# Altium PCB slave.PcbDoc (part 1 of 8)
Units mm, origin at the board's own origin, x right, y up, seen from the top; angles counter-clockwise.
Board outline 160 x 100 mm, 6 copper layers (Top, FUSED_VBAT-, Signals1, Signals2, SUPPLY, Bottom), stack 1.67 mm thick; 597 components, 381 nets, 1695 pads, 3029 vias.
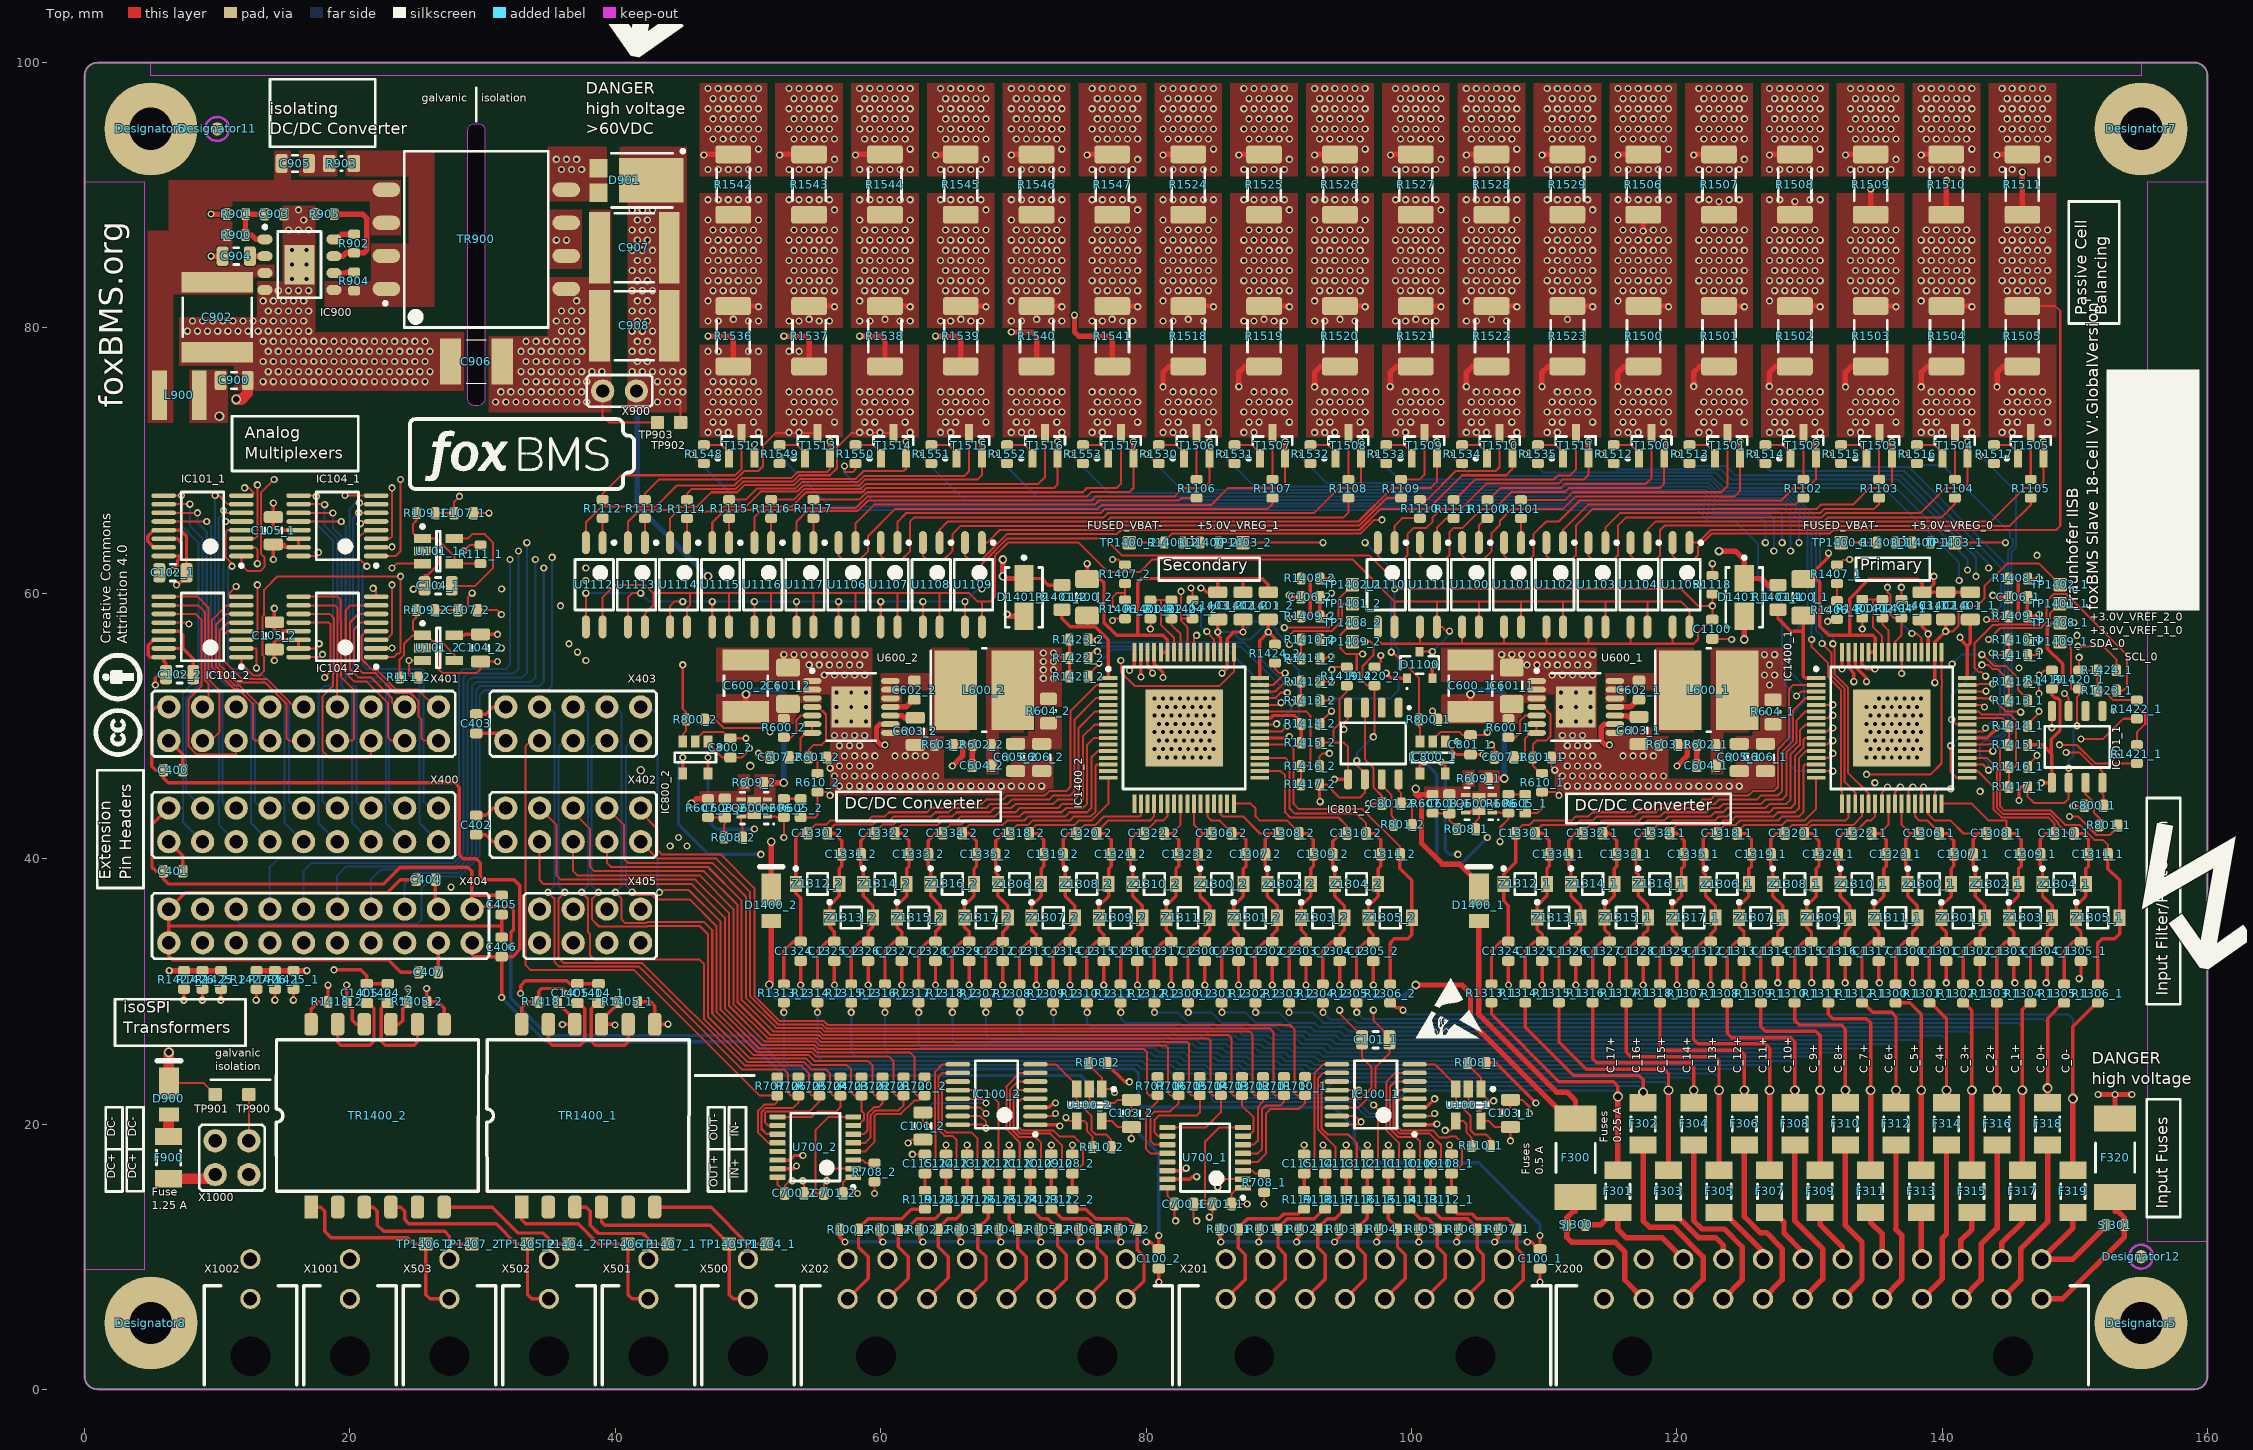
[diagram p0: Top view]
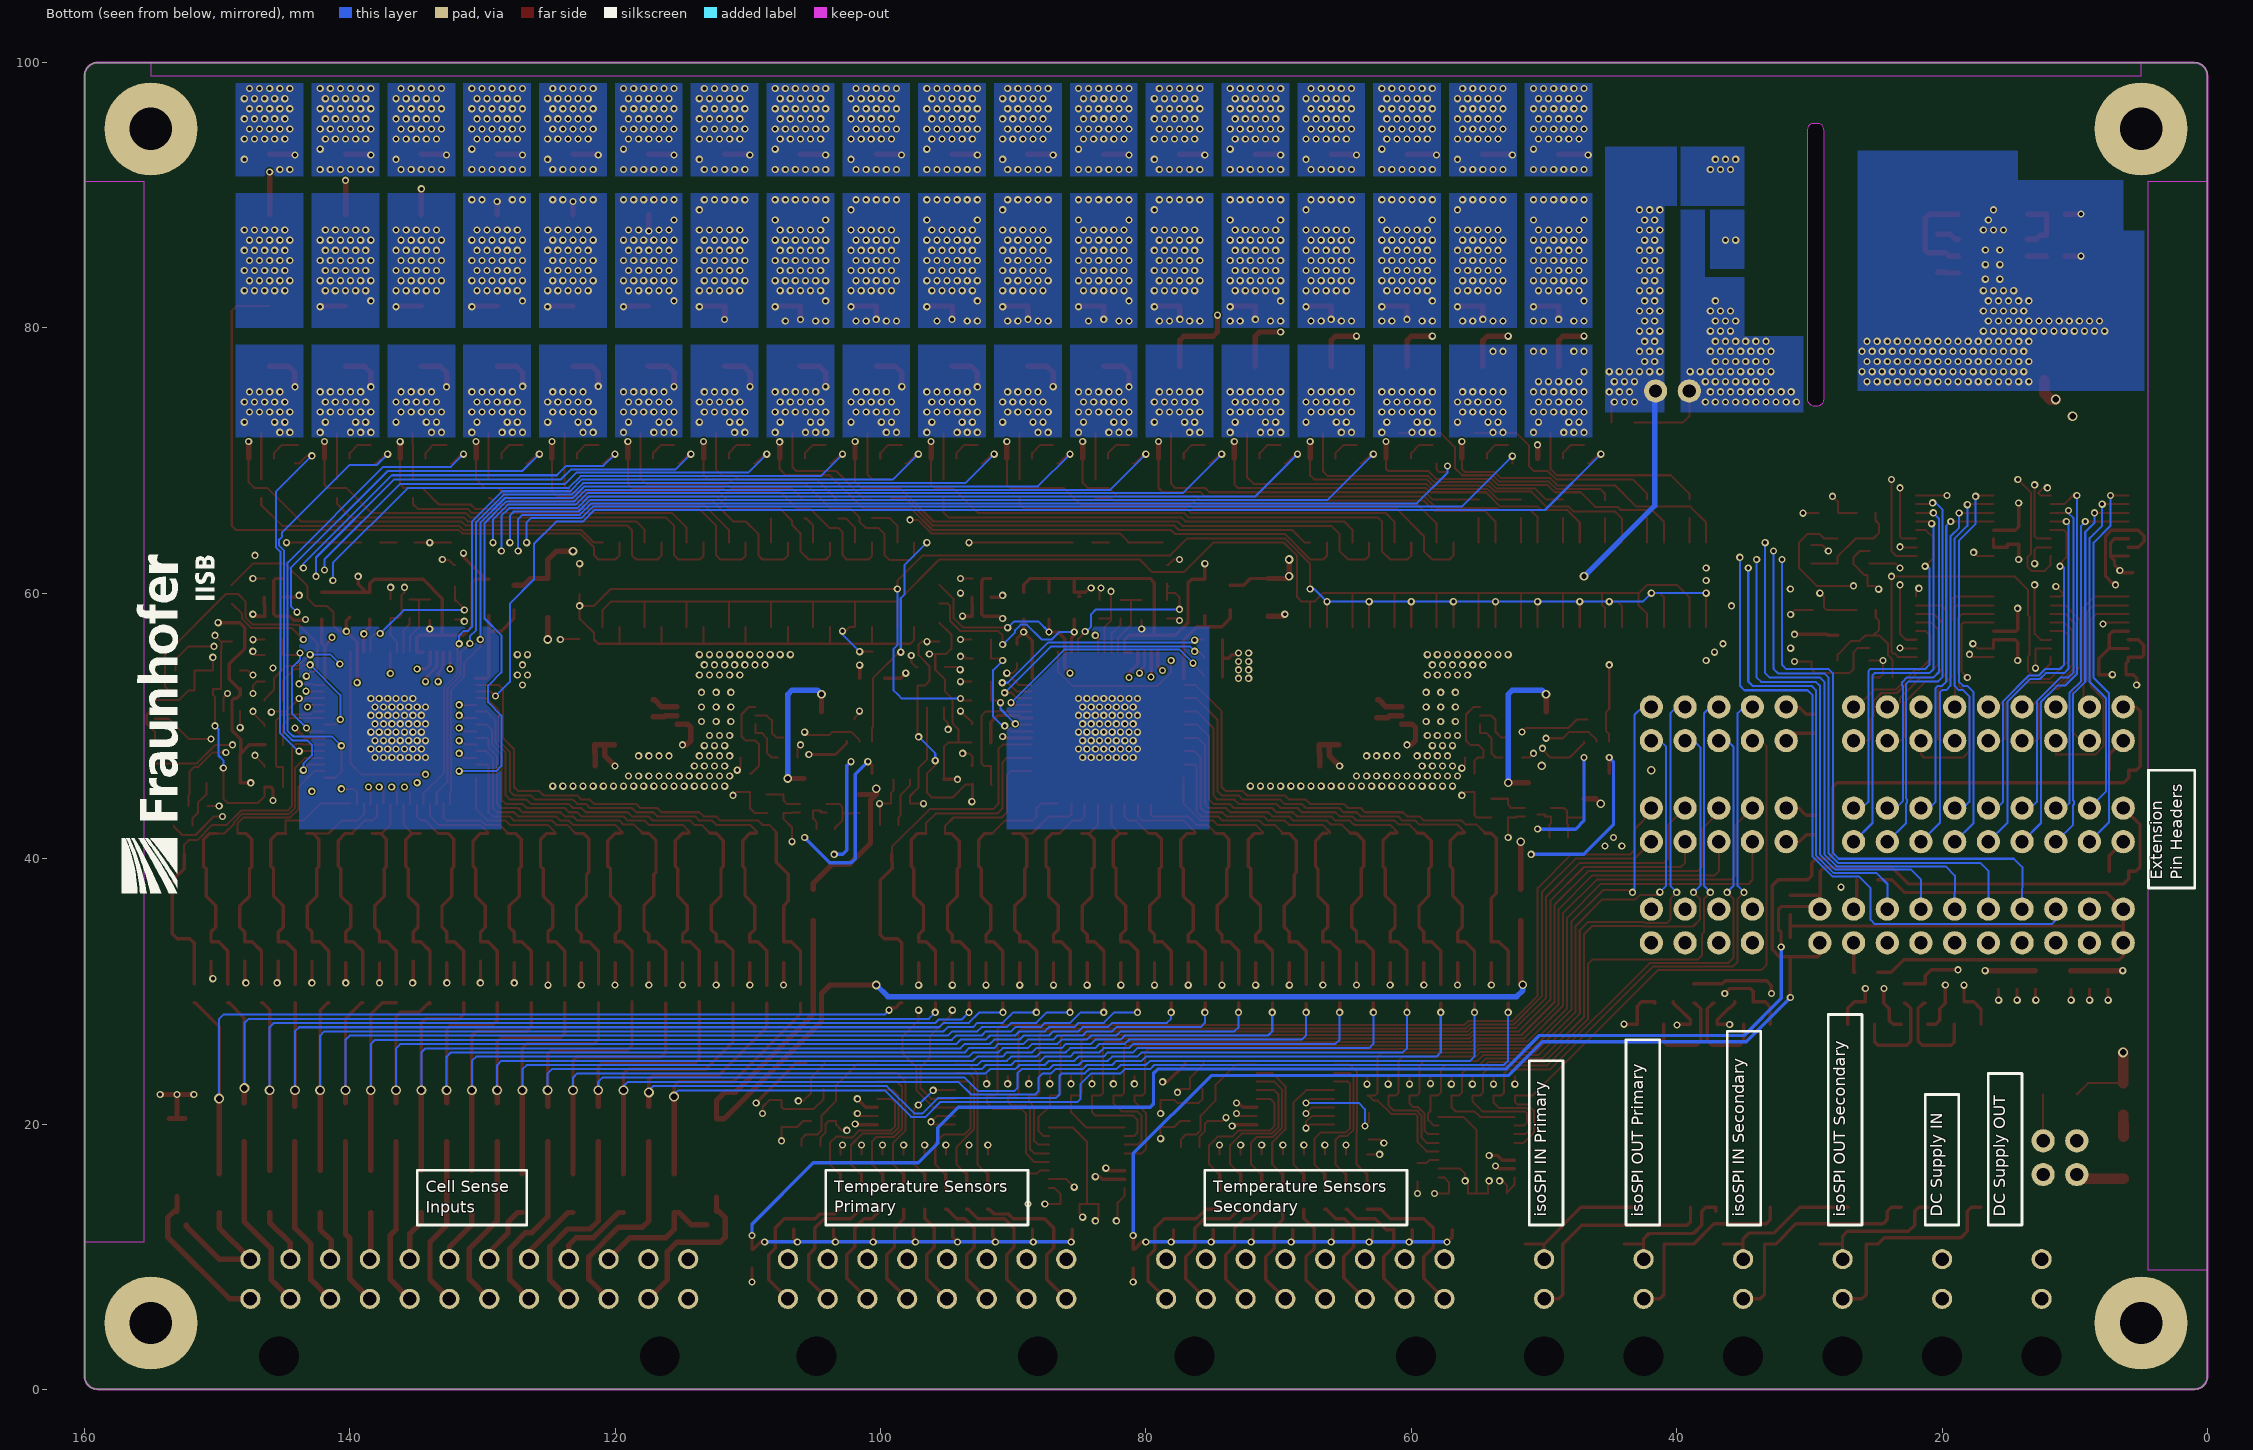
[diagram p1: Bottom view, seen from below]
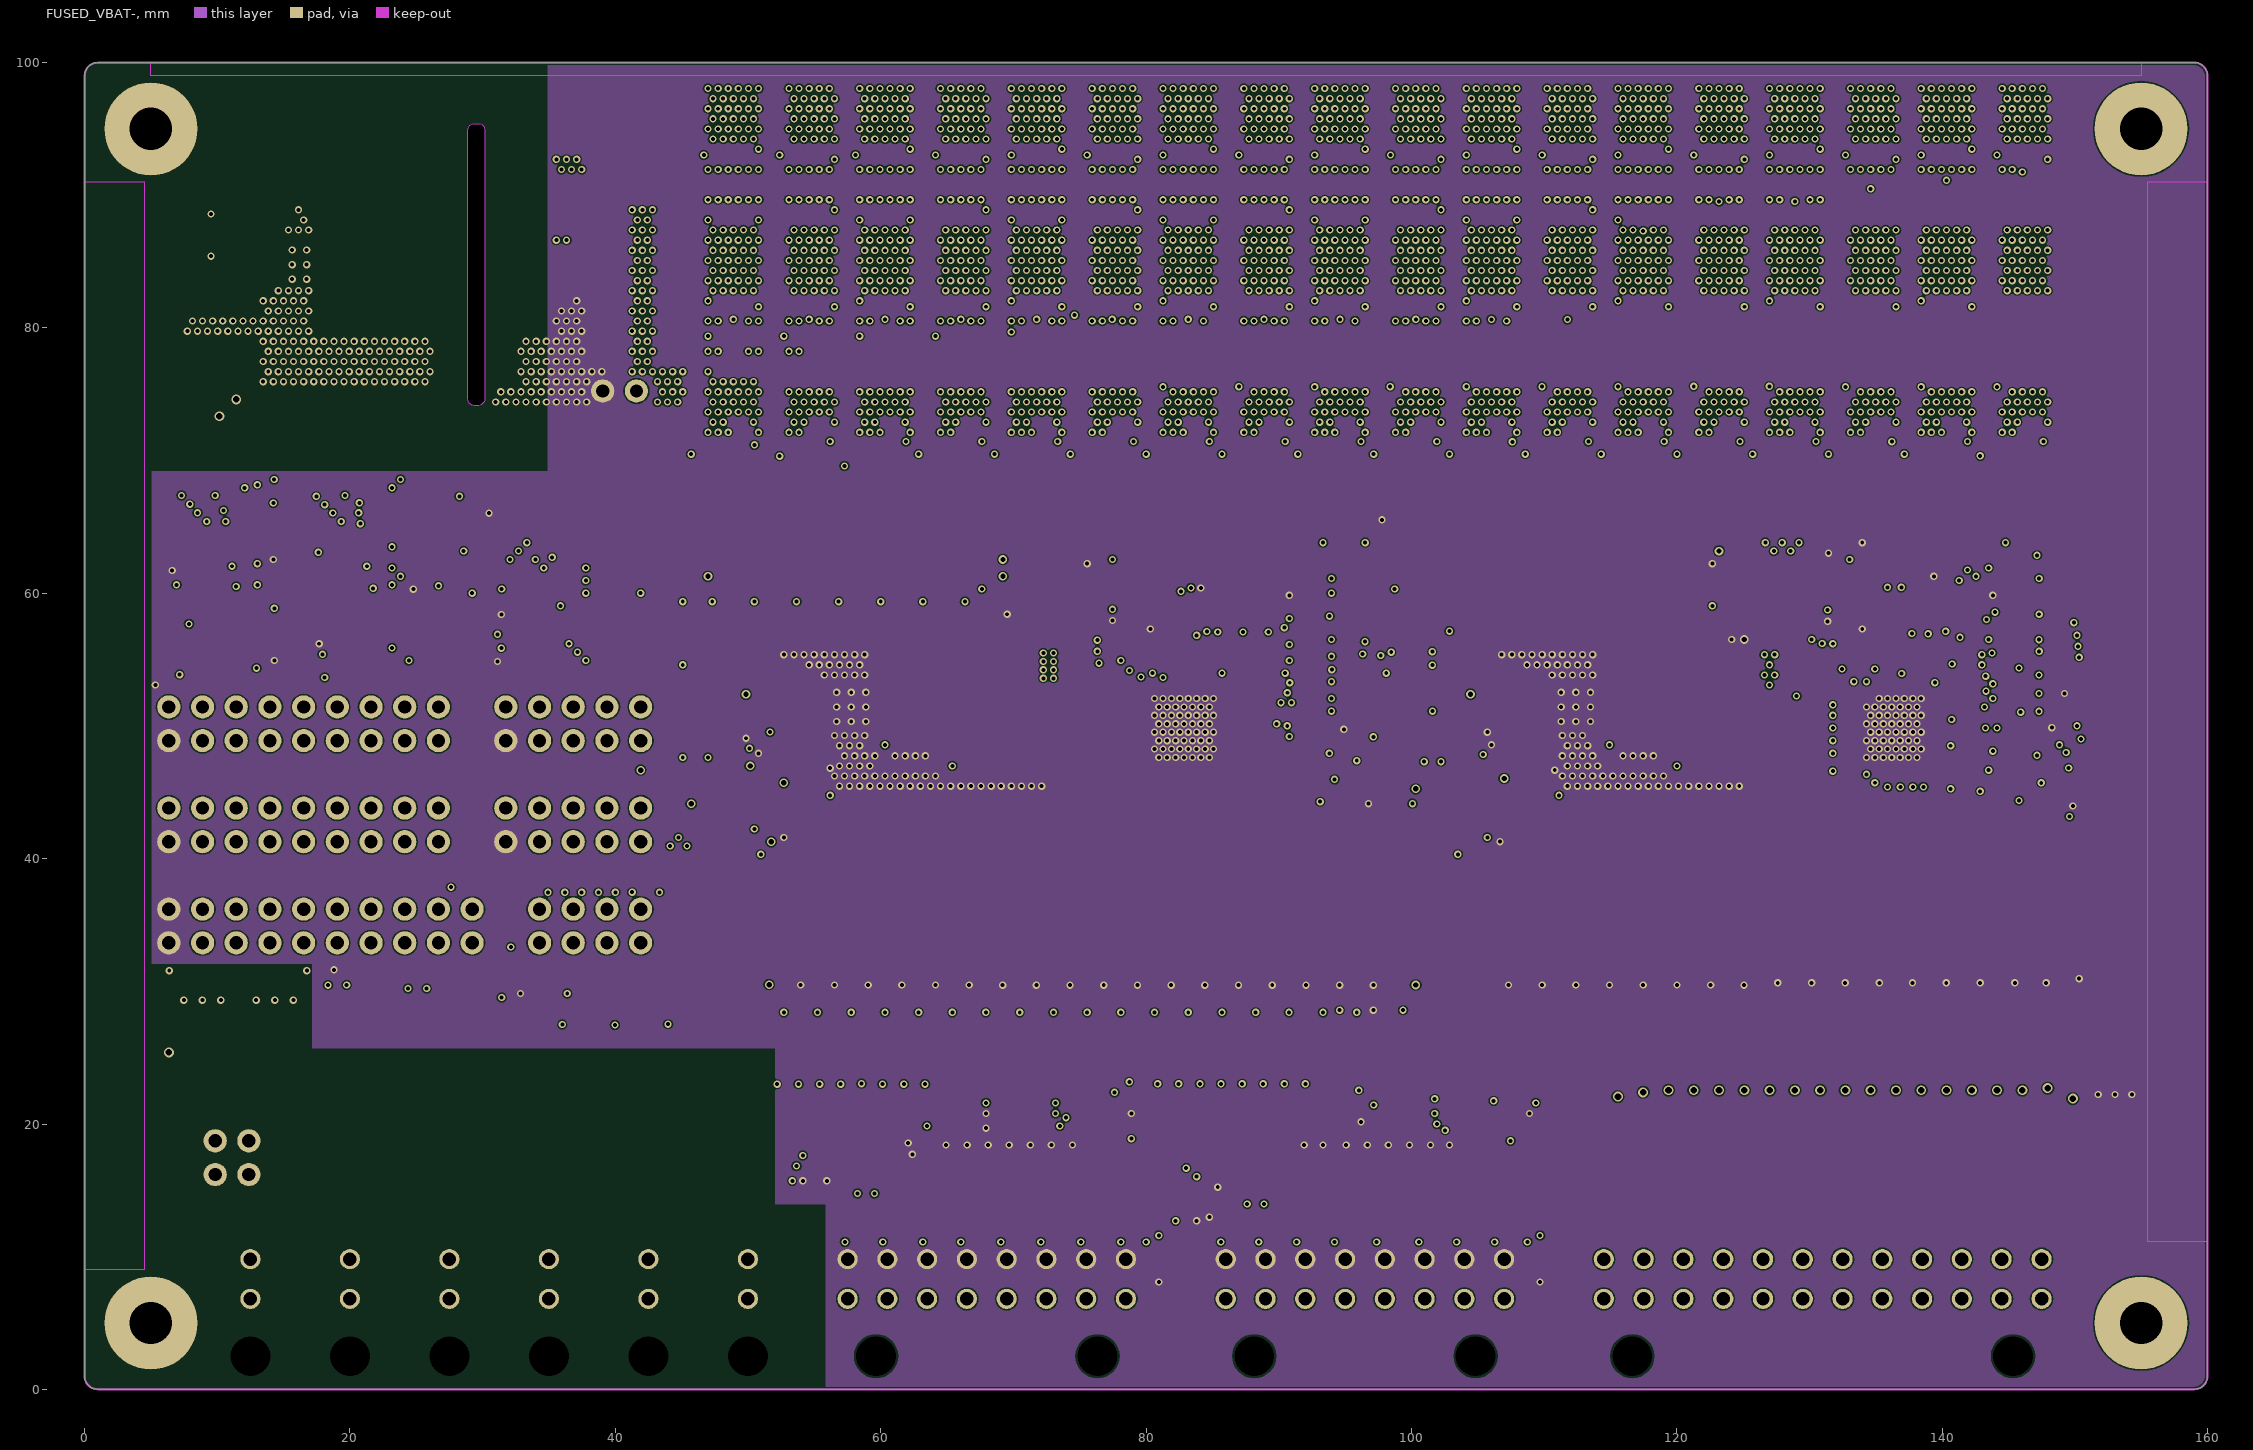
[diagram p2: FUSED_VBAT-]
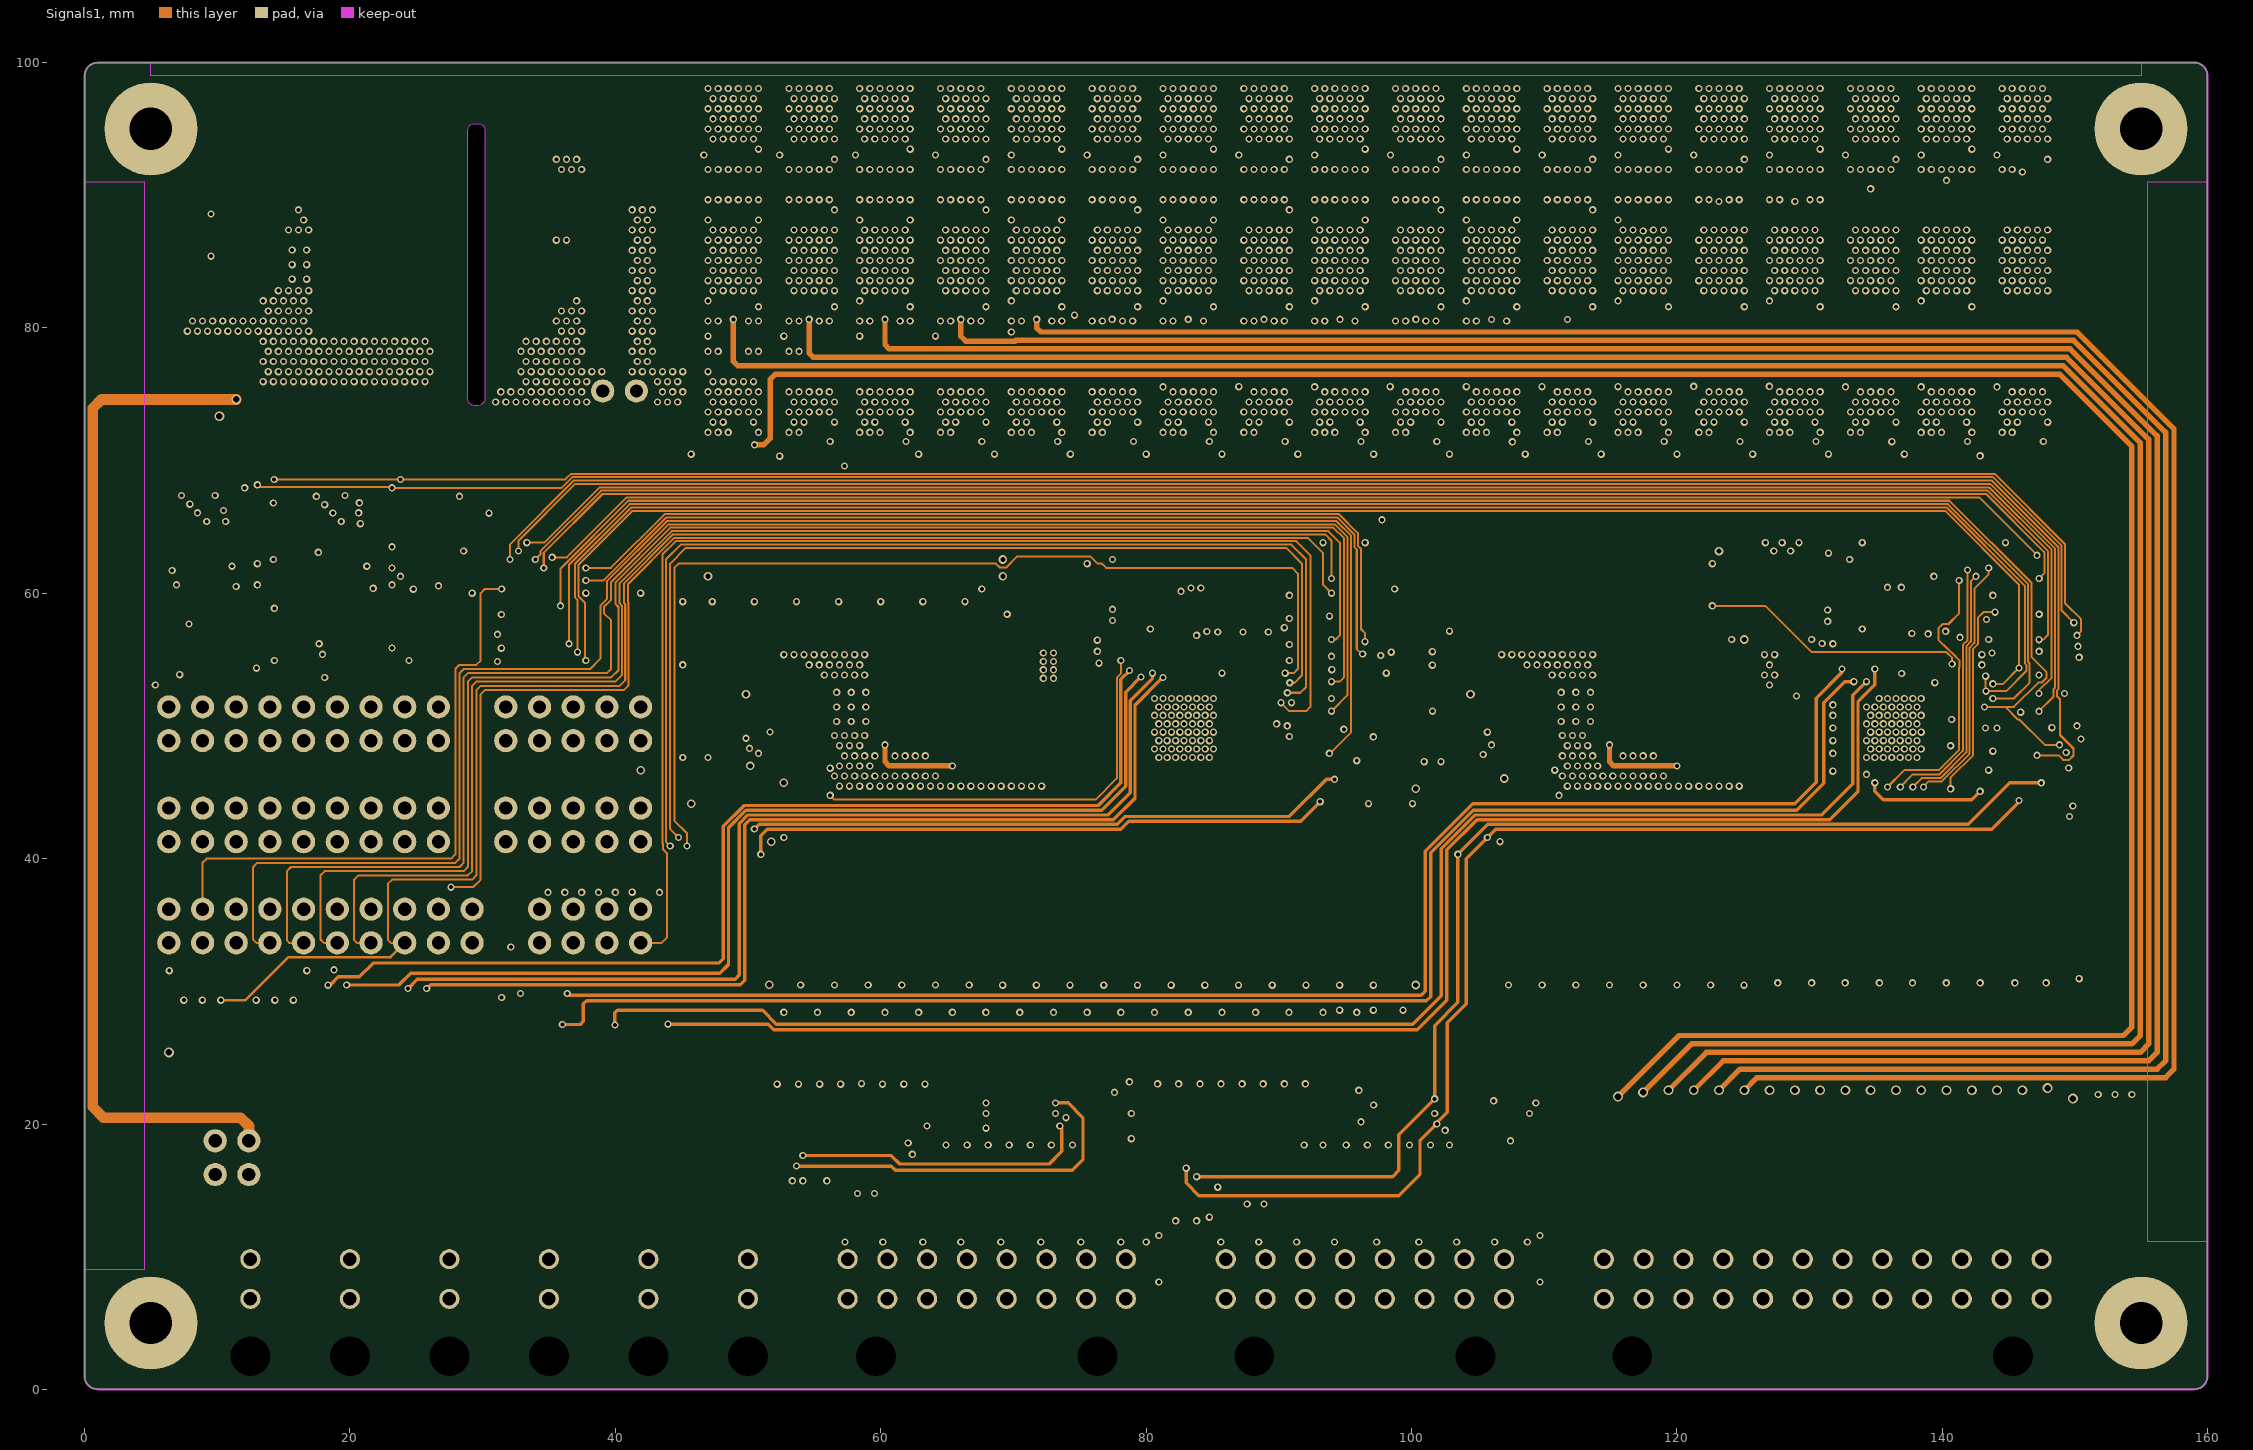
[diagram p3: Signals1]
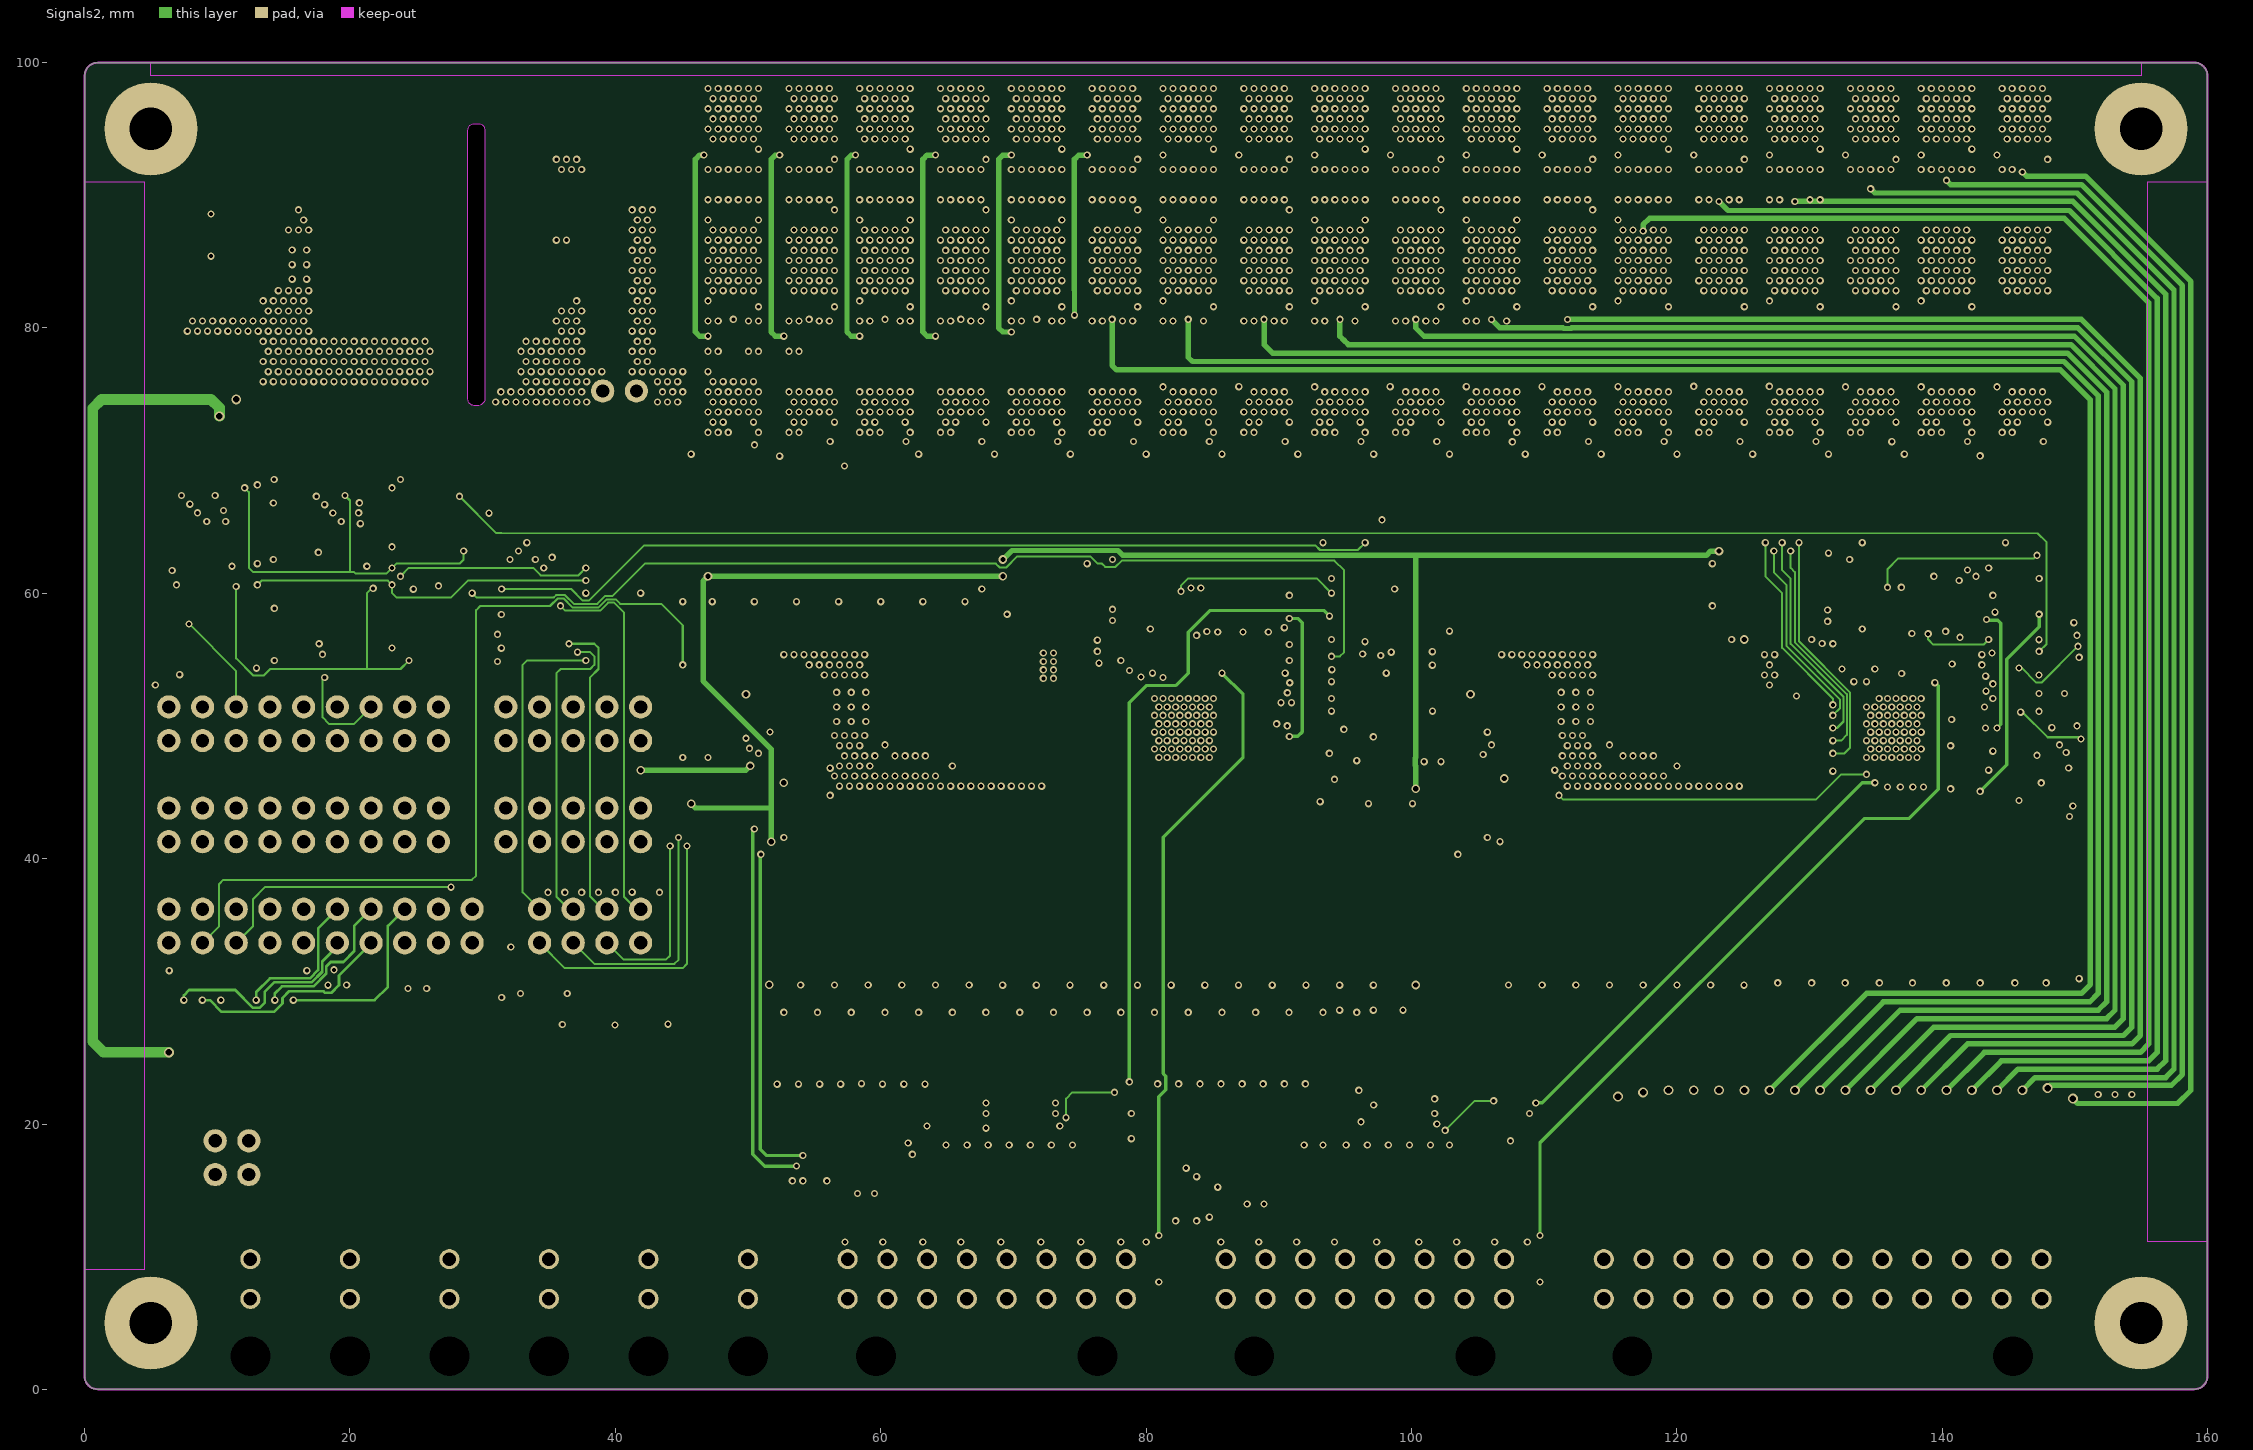
[diagram p4: Signals2]
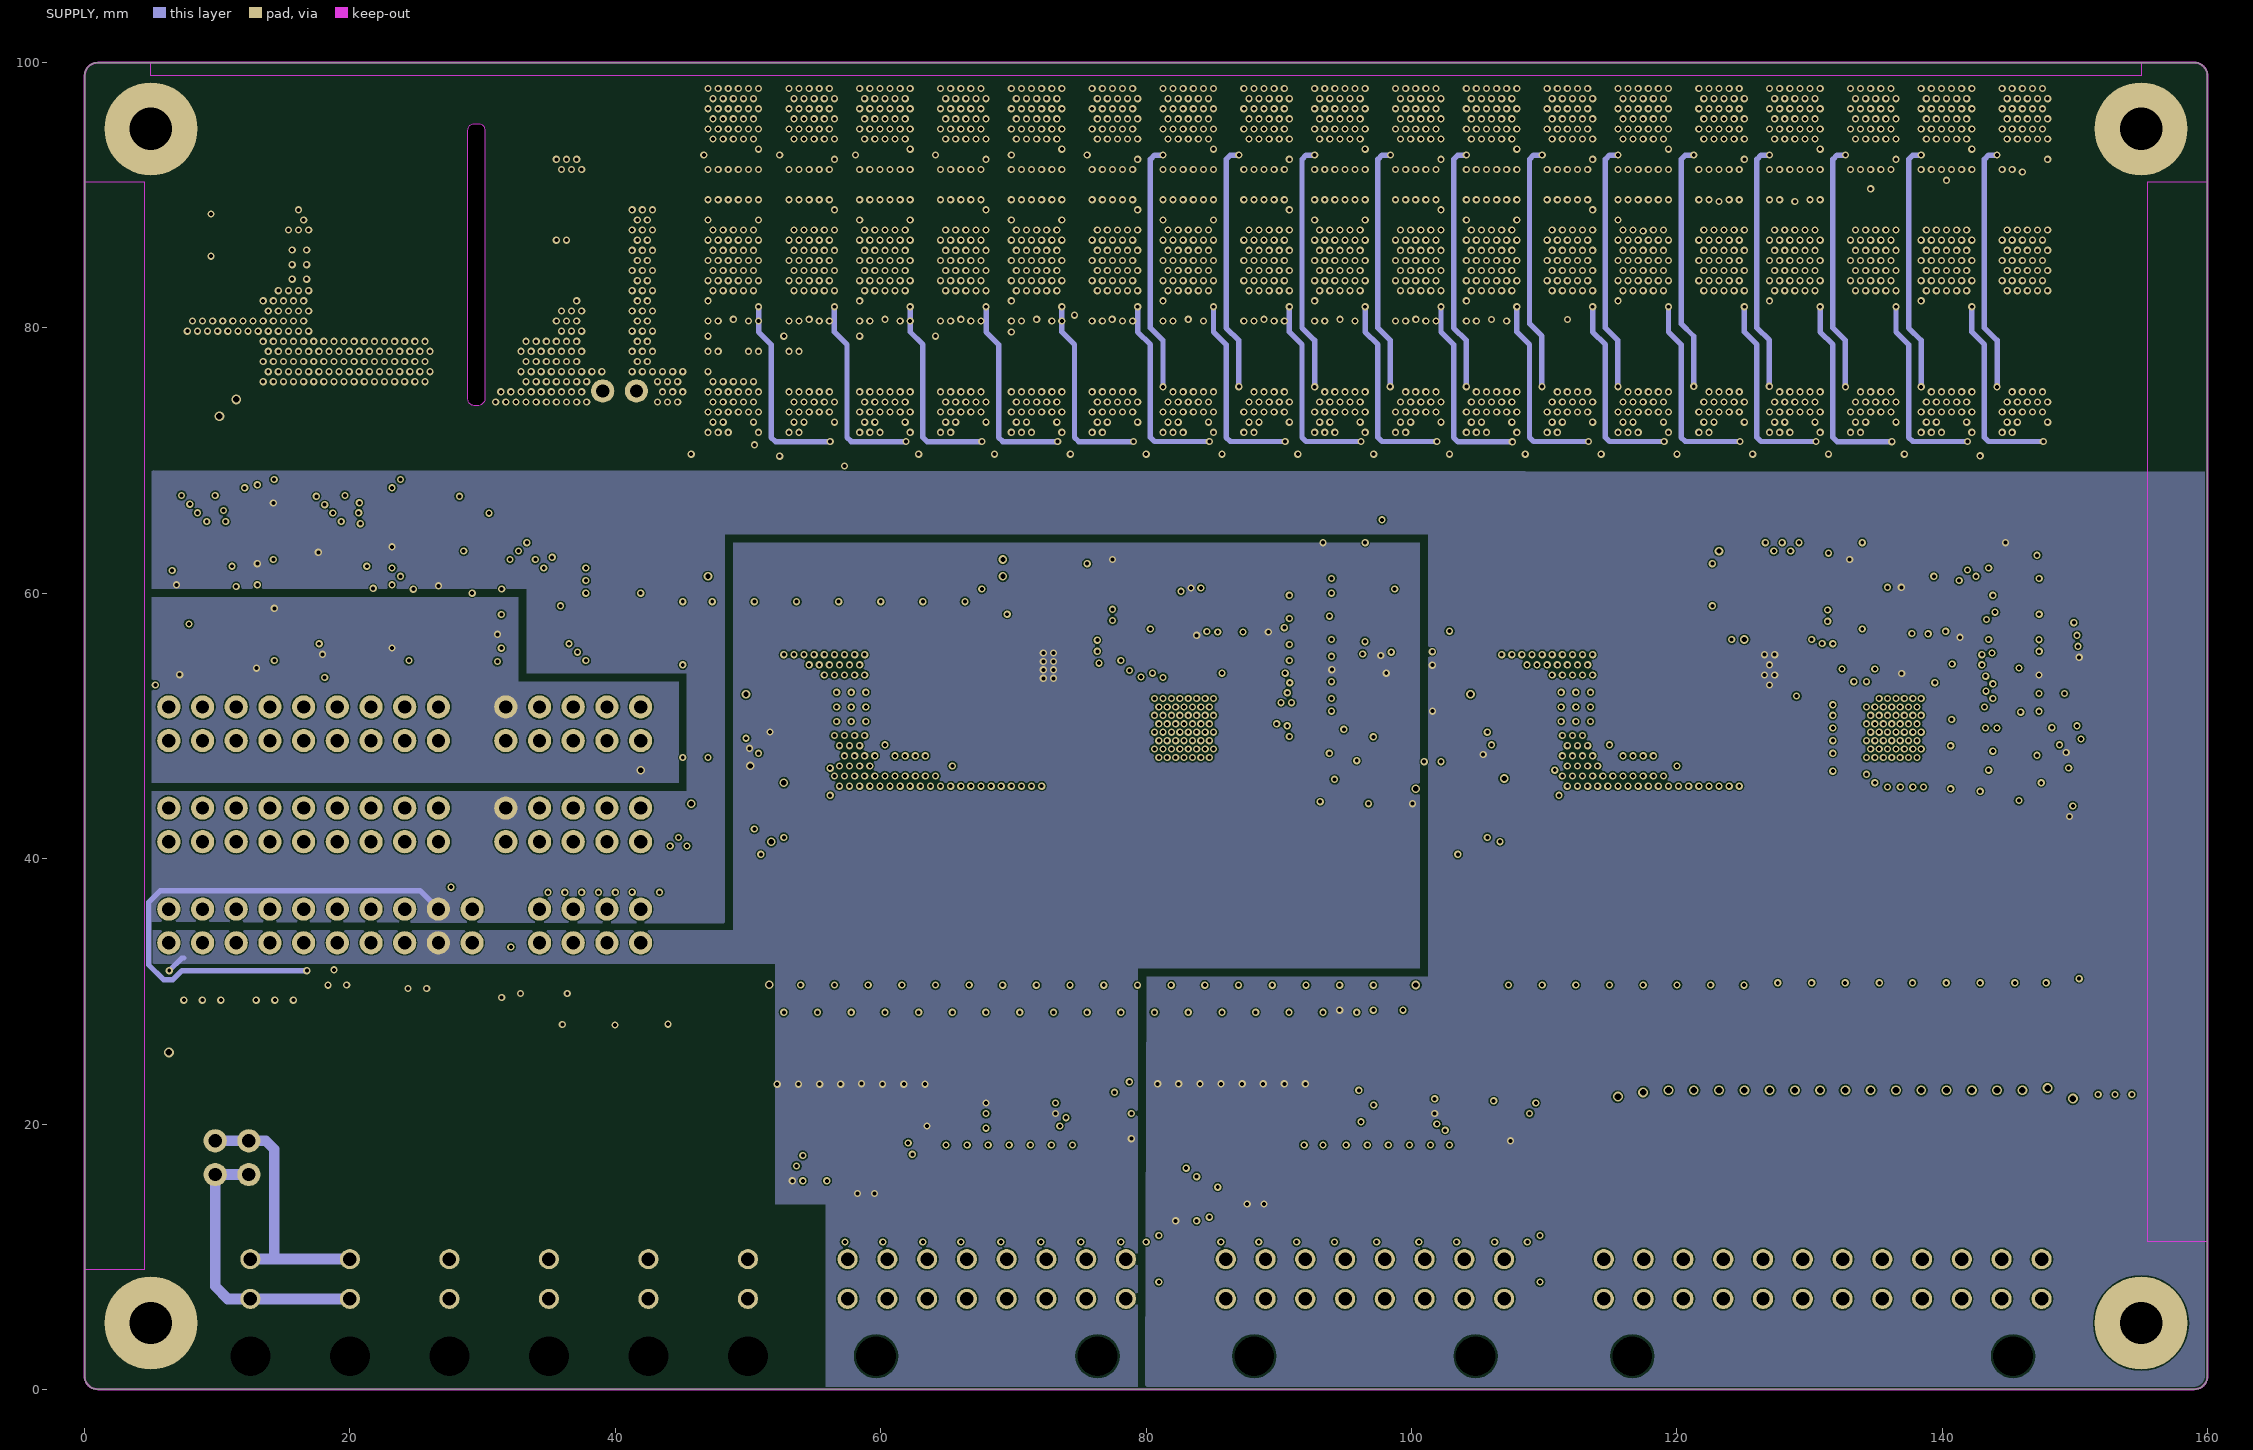
[diagram p5: SUPPLY]

## Layer stack, top to bottom
Top Solder: solder mask 0.015, Solder Resist, Dk 3.5
Top: signal copper 0.035
Dielectric 1: prepreg 0.2, FR-4, Dk 4.2
FUSED_VBAT-: signal copper 0.035
Dielectric2: core 0.35, FR-4, Dk 4.2
Signals1: signal copper 0.035
Dielectric3: prepreg 0.36, FR-4, Dk 4.2
Signals2: signal copper 0.035
Dielectric4: core 0.35, FR-4, Dk 4.2
SUPPLY: signal copper 0.035
Dielectric5: prepreg 0.2, FR-4, Dk 4.2
Bottom: signal copper 0.035
Bottom Solder: solder mask 0.015, Solder Resist, Dk 3.5

## Board outline
1,100 159,100 cw(c159,99) 160,99 160,1 cw(c159,1) 159,0 1,0 cw(c1,1) 0,1 0,99 cw(c1,99)
cut-out: 30.162,94.909 30.162,74.636 cw(c29.595,74.704) 29.527,74.136 29.393,74.136 cw(c29.393,74.636) 28.892,74.636 28.892,94.909 cw(c29.392,94.909) 29.393,95.409 29.663,95.409 cw(c29.663,94.909)

## Design rules (kind name [scope] priority, off if disabled: settings)
AssemblyTestPointUsage [All] p1 off:
AssemblyTestpoint [(IsPad And (OnTopLayer Or OnBottomLayer)) Or (IsPad And OnMultiLayer)] p1 off: testpointundercomponent=FALSE minsize=1.016 maxsize=2.54 preferedsize=1.524 minholesize=0 maxholesize=1.016 preferedholesize=0.813 testpointgrid=0.025 usegrid=TRUE gridtolerance=0 allowsidetop=TRUE
BoardOutlineClearance [All] p1: gap=0.203 ignorepadtopadclearanceinfootprint=FALSE except(0.508: Arc-CavityEdge Track-CavityEdge SMDPad-CavityEdge THPad-CavityEdge Via-CavityEdge Fill-CavityEdge Poly-CavityEdge Region-CavityEdge Text-CavityEdge)
Clearance "Stitching FUSED_CELL_10+" [IsStitchingVia and InNet('FUSED_CELL_10+') vs (IsVia and (Not IsStitchingVia)) Or IsPad] p1: gap=0.127 ignorepadtopadclearanceinfootprint=FALSE
Clearance [All] p2: gap=0.102 ignorepadtopadclearanceinfootprint=TRUE except(0.152: Arc-Text Arc-Hole Track-Text Track-Hole SMDPad-Text SMDPad-Hole THPad-Text THPad-Hole Via-Text Via-Hole Fill-Text Fill-Hole Poly-Text Poly-Hole Region-Text Region-Hole Text-Text Text-Hole; 0.203: Arc-Via Track-Via SMDPad-Via THPad-Via Via-Via)
FabricationTestpoint [All] p1: side=1 testpointundercomponent=TRUE minsize=0.508 maxsize=7.62 preferedsize=1.524 minholesize=0 maxholesize=1.016 preferedholesize=0.813 testpointgrid=0.025 allowsidetop=TRUE usegrid=FALSE gridtolerance=0
HoleSize [All] p1: absolutevalues=TRUE maxlimit=5.994 minlimit=0.2 maxpercent=80.000 minpercent=20.000
HoleToHoleClearance [All] p1: gap=0.152 allowstackedmicrovias=TRUE
MinimumAnnularRing [All] p1: minimumring=0.102
MinimumSolderMaskSliver [All] p1: minsoldermaskwidth=0.102
PlaneConnect [All] p1: planeconnectstyle=Direct reliefexpansion=0.508 reliefentries=4 reliefconductorwidth=0.254 reliefairgap=0.254
PolygonConnect [All] p1: connectstyle=Direct reliefconductorwidth=0.254 reliefentries=4 polygonreliefangle="90 Angle" airgapwidth=0.254
RoutingVias [All] p1: holewidth=0.203 width=0.45 viastyle="Through Hole" minholewidth=0.203 minwidth=0.45 maxholewidth=1 maxwidth=7 useviatemplates=TRUE viatemplateguid#1={0AB7DAA3-F58E-4780-A6E1-94A16C7095C0} viatemplateguid#2={26AB9DC0-33E3-4C9B-870D-B58389854110} viatemplateguid#3={9A71AE2B-4A20-477F-9082-EC06568001AF} viatemplatename#1=0.3mm_tented viatemplatename#2=0.4mm_tented viatemplatename#3=0.5mm_tented
SMDEntry [All] p1: side=TRUE corner=TRUE anyangle=FALSE
SMDToCorner [All] p1: distance=40000
SilkToSolderMaskClearance [IsPad] p1: minsilkscreentomaskgap=0.102 clearancetoexposedcopper=FALSE
SolderMaskExpansion SolderMaskExpansion_VIAs [IsVia] p1: expansion=-10 // Cover all Vias
SolderMaskExpansion [All] p2: expansion=0.051
UnRoutedNet [All] p1: checkbadconnections=TRUE
UnpouredPolygon UnpouredPolygon_1 [All] p1:
Width [All] p1: maxlimit=1.524 minlimit=0.102 preferedwidth=0.152
20 further rules are at their usual default settings.

## Classes and differential pairs
channel class dcdc_converter: U_primary_dcdc_converter U_secondary_dcdc_converter
channel class eeprom_temp_sens: U_primary_eeprom_temp_sens U_secondary_eeprom_temp_sens
channel class digital_io: U_primary_digital_io U_secondary_digital_io
channel class analog_in: U_primary_analog_in U_secondary_analog_in
channel class LTC: U_primary_LTC U_secondary_LTC
channel class input_filter: U_primary_input_filter U_secondary_input_filter
polygon class PolygonThermal_ON_Width60000_Gap78740: Polygon_1_Net_+5.0V_VREG_1
polygon class Isolate_10: Polygon_1_Net_+5.0V_VREG_1
pad class SMDPaste_OFF: IC201-P$1 IC301-P$1

## Components (designator, comment, footprint, x,y, rotation, side; value= is the part's Value field where it differs from the comment)
C100_1 "100n/50V" CAPC1608X08N 109.696,9.842 r90 top (schematic designator C100)
C100_2 "100n/50V" CAPC1608X08N 80.962,9.842 r90 top (schematic designator C100)
C101_1 "1u/50V" CAPC2012X14N 97.314,26.352 r180 top (schematic designator C101)
C101_2 "1u/50V" CAPC2012X14N 63.182,19.844 r90 top (schematic designator C101)
C102_1 "1u/50V" CAPC2012X14N 6.655,61.552 r0 top (schematic designator C102)
C102_2 "1u/50V" CAPC2012X14N 7.166,53.868 r0 top (schematic designator C102)
C103_1 "1u/50V" CAPC2012X14N 107.474,20.796 r270 top (schematic designator C103)
C103_2 "1u/50V" CAPC2012X14N 78.899,20.796 r270 top (schematic designator C103)
C104_1 "1u/50V" CAPC2012X14N 26.65,60.567 r0 top (schematic designator C104)
C104_2 "1u/50V" CAPC2012X14N 29.845,55.88 r90 top (schematic designator C104)
C105_1 "1u/50V" CAPC2012X14N 14.224,64.718 r90 top (schematic designator C105)
C105_2 "1u/50V" CAPC2012X14N 14.306,56.793 r90 top (schematic designator C105)
C106_1 "10n/100V" CAPC1608X08N 145.732,59.69 r0 top (schematic designator C106)
C106_2 "10n/100V" CAPC1608X08N 92.392,59.69 r0 top (schematic designator C106)
C107_1 "10n/100V" CAPC1608X08N 28.575,66.04 r180 top (schematic designator C107)
C107_2 "10n/100V" CAPC1608X08N 28.872,58.725 r180 top (schematic designator C107)
C108_1 "10n/100V" CAPC1608X08N 103.029,16.986 r270 top (schematic designator C108)
C108_2 "10n/100V" CAPC1608X08N 74.454,16.986 r270 top (schematic designator C108)
C109_1 "10n/100V" CAPC1608X08N 101.441,16.986 r270 top (schematic designator C109)
C109_2 "10n/100V" CAPC1608X08N 72.866,16.986 r270 top (schematic designator C109)
C110_1 "10n/100V" CAPC1608X08N 99.854,16.986 r270 top (schematic designator C110)
C110_2 "10n/100V" CAPC1608X08N 71.279,16.986 r270 top (schematic designator C110)
C111_1 "10n/100V" CAPC1608X08N 98.266,16.986 r270 top (schematic designator C111)
C111_2 "10n/100V" CAPC1608X08N 69.691,16.986 r270 top (schematic designator C111)
C112_1 "10n/100V" CAPC1608X08N 96.679,16.986 r270 top (schematic designator C112)
C112_2 "10n/100V" CAPC1608X08N 68.104,16.986 r270 top (schematic designator C112)
C113_1 "10n/100V" CAPC1608X08N 95.091,16.986 r270 top (schematic designator C113)
C113_2 "10n/100V" CAPC1608X08N 66.516,16.986 r270 top (schematic designator C113)
C114_1 "10n/100V" CAPC1608X08N 93.504,16.986 r270 top (schematic designator C114)
C114_2 "10n/100V" CAPC1608X08N 64.929,16.986 r270 top (schematic designator C114)
C115_1 "10n/100V" CAPC1608X08N 91.916,16.986 r270 top (schematic designator C115)
C115_2 "10n/100V" CAPC1608X08N 63.341,16.986 r270 top (schematic designator C115)
C400 "100n/50V" CAPC1608X08N 6.667,46.672 r180 top
C401 "100n/50V" CAPC1608X08N 6.667,39.052 r180 top
C402 "100n/50V" CAPC1608X08N 29.507,42.533 r90 top
C403 "100n/50V" CAPC1608X08N 29.527,50.165 r90 top
C404 "100n/50V" CAPC1608X08N 25.717,38.417 r0 top
C405 "100n/50V" CAPC1608X08N 31.432,36.512 r90 top
C406 "100n/50V" CAPC1608X08N 31.432,33.337 r270 top
C407 "100n/50V" CAPC1608X08N 25.925,31.432 r0 top
C600_1 "1u/250V" CAPC4532X16N 104.457,53.023 r270 top (schematic designator C600)
C600_2 "1u/250V" CAPC4532X16N 49.847,53.023 r270 top (schematic designator C600)
C601_1 "100n/200V" CAPC3216X18N 107.569,53.023 r270 top (schematic designator C601)
C601_2 "100n/200V" CAPC3216X18N 53.023,53.023 r270 top (schematic designator C601)
C602_1 "100n/50V" CAPC1608X08N 117.157,52.705 r270 top locked (schematic designator C602)
C602_2 "100n/50V" CAPC1608X08N 62.547,52.705 r270 top locked (schematic designator C602)
C603_1 "1u/50V" CAPC2012X14N 117.157,49.657 r90 top locked (schematic designator C603)
C603_2 "1u/50V" CAPC2012X14N 62.611,49.593 r90 top locked (schematic designator C603)
C604_1 "100n/50V" CAPC1608X08N 122.237,46.99 r0 top (schematic designator C604)
C604_2 "100n/50V" CAPC1608X08N 67.627,46.99 r0 top (schematic designator C604)
C605_1 "2u2/10V" CAPC2012X14N 124.714,47.625 r90 top (schematic designator C605)
C605_2 "2u2/10V" CAPC2012X14N 70.168,47.625 r90 top (schematic designator C605)
C606_1 "2u2/10V" CAPC2012X14N 126.682,47.625 r90 top (schematic designator C606)
C606_2 "2u2/10V" CAPC2012X14N 72.136,47.625 r90 top (schematic designator C606)
C607_1 "100n/50V" CAPC1608X08N 106.998,47.625 r180 top locked (schematic designator C607)
C607_2 "100n/50V" CAPC1608X08N 52.387,47.625 r180 top locked (schematic designator C607)
C608_1 "10n/100V" CAPC1608X08N 102.87,44.133 r270 top (schematic designator C608)
C608_2 "10n/100V" CAPC1608X08N 48.26,43.815 r270 top (schematic designator C608)
C700_1 "100n/50V" CAPC1608X08N 82.867,13.97 r180 top locked (schematic designator C700)
C700_2 "100n/50V" CAPC1608X08N 53.499,14.764 r180 top (schematic designator C700)
C701_1 "100n/50V" CAPC1608X08N 85.725,13.97 r0 top (schematic designator C701)
C701_2 "100n/50V" CAPC1608X08N 56.455,14.764 r0 top (schematic designator C701)
C800_1 "100n/50V" CAPC1608X08N 151.447,43.974 r0 top (schematic designator C800)
C800_2 "100n/50V" CAPC1608X08N 48.677,48.35 r270 top (schematic designator C800)
C801_1 "100n/50V" CAPC1608X08N 104.457,48.578 r270 top (schematic designator C801)
C801_2 "100n/50V" CAPC1608X08N 98.51,44.147 r0 top (schematic designator C801)
C900 "1u/50V" CAPC2012X14N 11.271,76.041 r180 top
C902 "22u/50V" CAPC2220(5750)230_N 10.001,80.804 r90 top
C903 "100n/50V" CAPC1608X08N 14.287,88.582 r180 top
C904 "1u/50V" CAPC2012X14N 11.43,85.407 r0 top
C905 "470p/100V" CAPC2012X14N 15.875,92.392 r180 top
C906 "4n7/1000V" CAPC4532X16N 29.527,77.47 r0 top locked
C907 "2u2/250V" CAPC2220(5750)230_N 41.434,86.042 r0 top locked
C908 "2u2/250V" CAPC2220(5750)230_N 41.434,80.169 r0 top locked
C1100 "100n/50V" CAPC1608X08N 122.687,57.291 r90 top
C1300_1 "10n/100V" CAPC1608X08N 137.775,33.008 r270 top (schematic designator C1300)
C1300_2 "10n/100V" CAPC1608X08N 84.435,33.008 r270 top (schematic designator C1300)
C1301_1 "10n/100V" CAPC1608X08N 140.315,33.008 r270 top (schematic designator C1301)
C1301_2 "10n/100V" CAPC1608X08N 86.975,33.008 r270 top (schematic designator C1301)
C1302_1 "10n/100V" CAPC1608X08N 142.855,33.008 r270 top (schematic designator C1302)
C1302_2 "10n/100V" CAPC1608X08N 89.515,33.008 r270 top (schematic designator C1302)
C1303_1 "10n/100V" CAPC1608X08N 145.395,33.008 r270 top (schematic designator C1303)
C1303_2 "10n/100V" CAPC1608X08N 92.055,33.008 r270 top (schematic designator C1303)
C1304_1 "10n/100V" CAPC1608X08N 147.935,33.008 r270 top (schematic designator C1304)
C1304_2 "10n/100V" CAPC1608X08N 94.595,33.008 r270 top (schematic designator C1304)
C1305_1 "10n/100V" CAPC1608X08N 150.475,33.008 r270 top (schematic designator C1305)
C1305_2 "10n/100V" CAPC1608X08N 97.135,33.008 r270 top (schematic designator C1305)
C1306_1 "10n/100V" CAPC1608X08N 139.045,41.898 r0 top (schematic designator C1306)
C1306_2 "10n/100V" CAPC1608X08N 85.705,41.898 r0 top (schematic designator C1306)
C1307_1 "10n/100V" CAPC1608X08N 141.617,40.322 r0 top (schematic designator C1307)
C1307_2 "10n/100V" CAPC1608X08N 88.265,40.322 r0 top (schematic designator C1307)
C1308_1 "10n/100V" CAPC1608X08N 144.125,41.898 r0 top (schematic designator C1308)
C1308_2 "10n/100V" CAPC1608X08N 90.785,41.898 r0 top (schematic designator C1308)
C1309_1 "10n/100V" CAPC1608X08N 146.685,40.322 r0 top (schematic designator C1309)
C1309_2 "10n/100V" CAPC1608X08N 93.345,40.322 r0 top (schematic designator C1309)
C1310_1 "10n/100V" CAPC1608X08N 149.205,41.898 r0 top (schematic designator C1310)
C1310_2 "10n/100V" CAPC1608X08N 95.865,41.898 r0 top (schematic designator C1310)
C1311_1 "10n/100V" CAPC1608X08N 151.765,40.322 r0 top (schematic designator C1311)
C1311_2 "10n/100V" CAPC1608X08N 98.425,40.322 r0 top (schematic designator C1311)
C1312_1 "10n/100V" CAPC1608X08N 122.555,33.02 r270 top (schematic designator C1312)
C1312_2 "10n/100V" CAPC1608X08N 69.195,33.008 r270 top (schematic designator C1312)
C1313_1 "10n/100V" CAPC1608X08N 125.075,33.008 r270 top (schematic designator C1313)
C1313_2 "10n/100V" CAPC1608X08N 71.735,33.008 r270 top (schematic designator C1313)
C1314_1 "10n/100V" CAPC1608X08N 127.615,33.008 r270 top (schematic designator C1314)
C1314_2 "10n/100V" CAPC1608X08N 74.275,33.008 r270 top (schematic designator C1314)
C1315_1 "10n/100V" CAPC1608X08N 130.155,33.008 r270 top (schematic designator C1315)
C1315_2 "10n/100V" CAPC1608X08N 76.815,33.008 r270 top (schematic designator C1315)
C1316_1 "10n/100V" CAPC1608X08N 132.695,33.008 r270 top (schematic designator C1316)
C1316_2 "10n/100V" CAPC1608X08N 79.355,33.008 r270 top (schematic designator C1316)
C1317_1 "10n/100V" CAPC1608X08N 135.235,33.008 r270 top (schematic designator C1317)
C1317_2 "10n/100V" CAPC1608X08N 81.895,33.008 r270 top (schematic designator C1317)
C1318_1 "10n/100V" CAPC1608X08N 123.805,41.898 r0 top (schematic designator C1318)
C1318_2 "10n/100V" CAPC1608X08N 70.465,41.898 r0 top (schematic designator C1318)
C1319_1 "10n/100V" CAPC1608X08N 126.365,40.322 r0 top (schematic designator C1319)
C1319_2 "10n/100V" CAPC1608X08N 73.025,40.322 r0 top (schematic designator C1319)
C1320_1 "10n/100V" CAPC1608X08N 128.885,41.898 r0 top (schematic designator C1320)
C1320_2 "10n/100V" CAPC1608X08N 75.545,41.898 r0 top (schematic designator C1320)
C1321_1 "10n/100V" CAPC1608X08N 131.445,40.322 r0 top (schematic designator C1321)
C1321_2 "10n/100V" CAPC1608X08N 78.105,40.322 r0 top (schematic designator C1321)
C1322_1 "10n/100V" CAPC1608X08N 133.965,41.898 r0 top (schematic designator C1322)
C1322_2 "10n/100V" CAPC1608X08N 80.625,41.898 r0 top (schematic designator C1322)
C1323_1 "10n/100V" CAPC1608X08N 136.525,40.322 r0 top (schematic designator C1323)
C1323_2 "10n/100V" CAPC1608X08N 83.185,40.322 r0 top (schematic designator C1323)
C1324_1 "10n/100V" CAPC1608X08N 107.315,33.02 r270 top (schematic designator C1324)
C1324_2 "10n/100V" CAPC1608X08N 53.975,33.02 r270 top (schematic designator C1324)
C1325_1 "10n/100V" CAPC1608X08N 109.855,33.02 r270 top (schematic designator C1325)
C1325_2 "10n/100V" CAPC1608X08N 56.515,33.02 r270 top (schematic designator C1325)
C1326_1 "10n/100V" CAPC1608X08N 112.395,33.02 r270 top (schematic designator C1326)
C1326_2 "10n/100V" CAPC1608X08N 59.055,33.02 r270 top (schematic designator C1326)
C1327_1 "10n/100V" CAPC1608X08N 114.935,33.02 r270 top (schematic designator C1327)
C1327_2 "10n/100V" CAPC1608X08N 61.595,33.02 r270 top (schematic designator C1327)
C1328_1 "10n/100V" CAPC1608X08N 117.475,33.02 r270 top (schematic designator C1328)
C1328_2 "10n/100V" CAPC1608X08N 64.135,33.02 r270 top (schematic designator C1328)
C1329_1 "10n/100V" CAPC1608X08N 120.015,33.02 r270 top (schematic designator C1329)
C1329_2 "10n/100V" CAPC1608X08N 66.675,33.02 r270 top (schematic designator C1329)
C1330_1 "10n/100V" CAPC1608X08N 108.585,41.91 r0 top (schematic designator C1330)
C1330_2 "10n/100V" CAPC1608X08N 55.245,41.91 r0 top (schematic designator C1330)
C1331_1 "10n/100V" CAPC1608X08N 111.125,40.322 r0 top (schematic designator C1331)
C1331_2 "10n/100V" CAPC1608X08N 57.785,40.322 r0 top (schematic designator C1331)
C1332_1 "10n/100V" CAPC1608X08N 113.665,41.91 r0 top (schematic designator C1332)
C1332_2 "10n/100V" CAPC1608X08N 60.325,41.91 r0 top (schematic designator C1332)
C1333_1 "10n/100V" CAPC1608X08N 116.205,40.322 r0 top (schematic designator C1333)
C1333_2 "10n/100V" CAPC1608X08N 62.865,40.322 r0 top (schematic designator C1333)
C1334_1 "10n/100V" CAPC1608X08N 118.745,41.91 r0 top (schematic designator C1334)
C1334_2 "10n/100V" CAPC1608X08N 65.405,41.91 r0 top (schematic designator C1334)
C1335_1 "10n/100V" CAPC1608X08N 121.285,40.322 r0 top (schematic designator C1335)
C1335_2 "10n/100V" CAPC1608X08N 67.945,40.322 r0 top (schematic designator C1335)
C1400_1 "100n/200V" CAPC3216X18N 129.54,59.69 r90 top locked (schematic designator C1400)
C1400_2 "100n/200V" CAPC3216X18N 75.565,59.69 r90 top (schematic designator C1400)
C1401_1 "1u/50V" CAPC2012X14N 142.13,59.055 r270 top (schematic designator C1401)
C1401_2 "1u/50V" CAPC2012X14N 89.218,59.055 r270 top (schematic designator C1401)
C1402_1 "1u/50V" CAPC2012X14N 140.272,59.055 r270 top (schematic designator C1402)
C1402_2 "1u/50V" CAPC2012X14N 87.312,59.055 r270 top (schematic designator C1402)
C1403_1 "1u/50V" CAPC2012X14N 138.493,59.055 r270 top locked (schematic designator C1403)
C1403_2 "1u/50V" CAPC2012X14N 85.407,59.055 r270 top locked (schematic designator C1403)
C1404_1 "100p/50V" CAPC1608X08N 38.735,29.845 r270 top (schematic designator C1404)
C1404_2 "100p/50V" CAPC1608X08N 22.86,29.845 r270 top (schematic designator C1404)
C1405_1 "100p/50V" CAPC1608X08N 37.148,29.845 r270 top (schematic designator C1405)
C1405_2 "100p/50V" CAPC1608X08N 21.273,29.845 r270 top locked (schematic designator C1405)
D900 "DFLS1100-7" DIOD-POWERDI123-2_V 6.35,22.225 r90 top locked
D901 "PDS3200" PowerDI5 41.593,91.123 r0 top locked
D1100 "BAT54C,215" NXP-SOT23-3_V 100.627,54.598 r180 top
D1400_1 "DFLS1100-7" DIOD-POWERDI123-2_V 105.093,36.83 r90 top (schematic designator D1400)
D1400_2 "DFLS1100-7" DIOD-POWERDI123-2_V 51.752,36.83 r90 top (schematic designator D1400)
D1401_1 "SMAJ85A-E3/61" VISH-DO-214AC-2_L 125.095,59.69 r270 top (schematic designator D1401)
D1401_2 "SMAJ85A-E3/61" VISH-DO-214AC-2_L 70.802,59.69 r270 top (schematic designator D1401)
Designator5 "Comment" Hole_3.2_Iso 155,5 r0 top locked
Designator6 "Comment" Hole_3.2_Iso 5,95 r0 top locked
Designator7 "Comment" Hole_3.2_Iso 155,95 r0 top locked
Designator8 "Comment" Hole_3.2_Iso 5,5 r0 top locked
Designator11 "Comment" Fiducial_2 10,95 r0 top
Designator12 "Comment" Fiducial_2 155,10 r0 top
F300 "fuse_0.5A_0448.500MR" LITTLEFUSE_448 112.375,17.45 r90 top locked
F301 "fuse_0.25A_0466.250NR" LITTLEFUSE_466 115.57,14.922 r90 top locked
F302 "fuse_0.25A_0466.250NR" LITTLEFUSE_466 117.475,20.002 r90 top locked
F303 "fuse_0.25A_0466.250NR" LITTLEFUSE_466 119.38,14.922 r90 top locked
F304 "fuse_0.25A_0466.250NR" LITTLEFUSE_466 121.285,20.002 r90 top locked
F305 "fuse_0.25A_0466.250NR" LITTLEFUSE_466 123.19,14.922 r90 top locked
F306 "fuse_0.25A_0466.250NR" LITTLEFUSE_466 125.095,20.002 r90 top locked
F307 "fuse_0.25A_0466.250NR" LITTLEFUSE_466 127,14.922 r90 top locked
F308 "fuse_0.25A_0466.250NR" LITTLEFUSE_466 128.905,20.002 r90 top locked
F309 "fuse_0.25A_0466.250NR" LITTLEFUSE_466 130.81,14.922 r90 top locked
F310 "fuse_0.25A_0466.250NR" LITTLEFUSE_466 132.715,20.002 r90 top locked
F311 "fuse_0.25A_0466.250NR" LITTLEFUSE_466 134.62,14.922 r90 top locked
F312 "fuse_0.25A_0466.250NR" LITTLEFUSE_466 136.525,20.002 r90 top locked
F313 "fuse_0.25A_0466.250NR" LITTLEFUSE_466 138.43,14.922 r90 top locked
F314 "fuse_0.25A_0466.250NR" LITTLEFUSE_466 140.335,20.002 r90 top locked
F315 "fuse_0.25A_0466.250NR" LITTLEFUSE_466 142.24,14.922 r90 top locked
F316 "fuse_0.25A_0466.250NR" LITTLEFUSE_466 144.145,20.002 r90 top locked
F317 "fuse_0.25A_0466.250NR" LITTLEFUSE_466 146.05,14.922 r90 top locked
F318 "fuse_0.25A_0466.250NR" LITTLEFUSE_466 147.955,20.002 r90 top locked
F319 "fuse_0.25A_0466.250NR" LITTLEFUSE_466 149.86,14.922 r90 top locked
F320 "fuse_0.5A_0448.500MR" LITTLEFUSE_448 153.035,17.462 r90 top locked
F900 "fuse_1.25A_04661.25NR" LITTLEFUSE_466 6.33,17.462 r90 top locked
IC100_1 "ADG728BRUZ" ADI-RU-16_M 97.314,22.225 r180 top locked (schematic designator IC100)
IC100_2 "ADG728BRUZ" ADI-RU-16_M 68.739,22.225 r180 top locked (schematic designator IC100)
IC101_1 "ADG728BRUZ" ADI-RU-16_M 8.89,65.087 r180 top (schematic designator IC101)
IC101_2 "ADG728BRUZ" ADI-RU-16_M 8.89,57.468 r180 top (schematic designator IC101)
IC104_1 "ADG728BRUZ" ADI-RU-16_M 19.05,65.087 r180 top (schematic designator IC104)
IC104_2 "ADG728BRUZ" ADI-RU-16_M 19.05,57.468 r180 top (schematic designator IC104)
IC800_1 "MCP9800A0T-M/OT" SOT-23-OT5_L 101.6,47.625 r270 top locked (schematic designator IC800)
IC800_2 "MCP9800A0T-M/OT" SOT-23-OT5_L 46.038,47.625 r270 top locked (schematic designator IC800)
IC801_1 "M24M02-DWMN3TP/K" SOIC127P600X175-8N 150.177,48.419 r270 top (schematic designator IC801)
IC801_2 "M24M02-DWMN3TP/K" SOIC127P600X175-8N 97.135,48.68 r270 top (schematic designator IC801)
IC900 "LT8302HS8E#PBF" LT-S8E-8_V 16.192,84.772 r0 top locked
IC1400_1 "LTC6813HLWE-1#3ZZPBF" TSQFP50P1200X1200X160_HS-65N 136.207,49.847 r0 top (schematic designator IC1400)
IC1400_2 "LTC6813HLWE-1#3ZZPBF" TSQFP50P1200X1200X160_HS-65N 82.867,49.847 r0 top locked (schematic designator IC1400)
L600_1 "220µH" TYS6045221M-10 122.428,52.705 r0 top (schematic designator L600)
L600_2 "220µH" TYS6045221M-10 67.818,52.705 r0 top locked (schematic designator L600)
L900 "74404042100" "WE-LQS 4018" 7.144,74.93 r180 top
LD1400_1 "green" LEDC1608X07N 138.43,63.817 r0 top locked (schematic designator LD1400)
LD1400_2 "green" LEDC1608X07N 84.772,63.817 r0 top locked (schematic designator LD1400)
Q600_1 "PBSS4112PANP" PBSS4112PANP 105.093,44.133 r180 top (schematic designator Q600)
Q600_2 "PBSS4112PANP" PBSS4112PANP 50.482,43.815 r180 top (schematic designator Q600)
R100_1 "10k" RESC1608X05N 86.253,12.061 r180 top locked (schematic designator R100)
R100_2 "10k" RESC1608X05N 57.631,12.035 r180 top locked (schematic designator R100)
R101_1 "10k" RESC1608X05N 89.253,12.061 r180 top locked (schematic designator R101)
R101_2 "10k" RESC1608X05N 60.631,12.035 r180 top locked (schematic designator R101)
R102_1 "10k" RESC1608X05N 92.253,12.061 r180 top locked (schematic designator R102)
R102_2 "10k" RESC1608X05N 63.631,12.035 r180 top locked (schematic designator R102)
R103_1 "10k" RESC1608X05N 95.253,12.061 r180 top locked (schematic designator R103)
R103_2 "10k" RESC1608X05N 66.632,12.035 r180 top locked (schematic designator R103)
R104_1 "10k" RESC1608X05N 98.253,12.061 r180 top locked (schematic designator R104)
R104_2 "10k" RESC1608X05N 69.632,12.035 r180 top locked (schematic designator R104)
R105_1 "10k" RESC1608X05N 101.253,12.061 r180 top locked (schematic designator R105)
R105_2 "10k" RESC1608X05N 72.632,12.035 r180 top locked (schematic designator R105)
R106_1 "10k" RESC1608X05N 104.253,12.061 r180 top locked (schematic designator R106)
R106_2 "10k" RESC1608X05N 75.632,12.035 r180 top locked (schematic designator R106)
R107_1 "10k" RESC1608X05N 107.253,12.061 r180 top locked (schematic designator R107)
R107_2 "10k" RESC1608X05N 78.632,12.035 r180 top locked (schematic designator R107)
R108_1 "100R" RESC1608X05N 104.934,24.606 r0 top (schematic designator R108)
R108_2 "100R" RESC1608X05N 76.359,24.606 r0 top (schematic designator R108)
R109_1 "100R" RESC1608X05N 25.717,66.04 r0 top locked (schematic designator R109)
R109_2 "100R" RESC1608X05N 25.697,58.725 r0 top locked (schematic designator R109)
R110_1 "0R" RESC1608X05N 105.249,18.347 r180 top (schematic designator R110)
R110_2 "0R" RESC1608X05N 76.674,18.256 r180 top (schematic designator R110)
R111_1 "0R" RESC1608X05N 29.845,62.938 r270 top (schematic designator R111)
R111_2 "0R" RESC1608X05N 24.447,53.657 r180 top (schematic designator R111)
R112_1 "100R" RESC1608X05N 103.029,14.287 r270 top (schematic designator R112)
R112_2 "100R" RESC1608X05N 74.454,14.287 r270 top (schematic designator R112)
R113_1 "100R" RESC1608X05N 101.441,14.287 r270 top (schematic designator R113)
R113_2 "100R" RESC1608X05N 72.866,14.287 r270 top (schematic designator R113)
R114_1 "100R" RESC1608X05N 99.854,14.287 r270 top (schematic designator R114)
R114_2 "100R" RESC1608X05N 71.279,14.287 r270 top (schematic designator R114)
R115_1 "100R" RESC1608X05N 98.266,14.287 r270 top (schematic designator R115)
R115_2 "100R" RESC1608X05N 69.691,14.287 r270 top (schematic designator R115)
R116_1 "100R" RESC1608X05N 96.679,14.287 r270 top (schematic designator R116)
R116_2 "100R" RESC1608X05N 68.104,14.287 r270 top (schematic designator R116)
R117_1 "100R" RESC1608X05N 95.091,14.287 r270 top (schematic designator R117)
R117_2 "100R" RESC1608X05N 66.516,14.287 r270 top (schematic designator R117)
R118_1 "100R" RESC1608X05N 93.504,14.287 r270 top (schematic designator R118)
R118_2 "100R" RESC1608X05N 64.929,14.287 r270 top (schematic designator R118)
R119_1 "100R" RESC1608X05N 91.916,14.287 r270 top (schematic designator R119)
R119_2 "100R" RESC1608X05N 63.341,14.287 r270 top (schematic designator R119)
R600_1 "124k" RESC1608X05N 107.315,49.847 r90 top locked (schematic designator R600)
R600_2 "124k" RESC1608X05N 52.705,49.847 r90 top locked (schematic designator R600)
R601_1 "10k" RESC1608X05N 109.855,47.625 r0 top locked (schematic designator R601)
R601_2 "10k" RESC1608X05N 55.245,47.625 r0 top locked (schematic designator R601)
R602_1 "1k5" RESC1608X05N 122.237,48.578 r180 top locked (schematic designator R602)
R602_2 "1k5" RESC1608X05N 67.627,48.578 r180 top locked (schematic designator R602)
R603_1 "1k" RESC1608X05N 119.38,48.578 r180 top (schematic designator R603)
R603_2 "1k" RESC1608X05N 64.77,48.578 r180 top (schematic designator R603)
R604_1 "1R" RESC2012X05N 127.254,51.054 r270 top (schematic designator R604)
R604_2 "1R" RESC2012X05N 72.644,51.117 r270 top locked (schematic designator R604)
R605_1 "10k" RESC1608X05N 108.585,44.133 r90 top (schematic designator R605)
R605_2 "10k" RESC1608X05N 53.975,43.815 r90 top (schematic designator R605)
R606_1 "124k" RESC1608X05N 107.315,44.133 r90 top (schematic designator R606)
R606_2 "124k" RESC1608X05N 52.705,43.815 r90 top (schematic designator R606)
R607_1 "10k" RESC1608X05N 101.6,44.133 r90 top (schematic designator R607)
R607_2 "10k" RESC1608X05N 46.988,43.815 r90 top (schematic designator R607)
R608_1 "68k" RESC1608X05N 104.14,42.227 r180 top (schematic designator R608)
R608_2 "68k" RESC1608X05N 48.895,41.593 r180 top (schematic designator R608)
R609_1 "0R" RESC1608X05N 105.093,46.038 r180 top (schematic designator R609)
R609_2 "0R" RESC1608X05N 50.482,45.72 r180 top (schematic designator R609)
R610_1 "0R" RESC1608X05N 109.855,45.72 r270 top (schematic designator R610)
R610_2 "0R" RESC1608X05N 55.245,45.72 r270 top (schematic designator R610)
R700_1 "10k" RESC1608X05N 91.99,22.861 r90 top locked (schematic designator R700)
R700_2 "10k" RESC1608X05N 63.317,22.835 r90 top locked (schematic designator R700)
R701_1 "10k" RESC1608X05N 90.402,22.861 r90 top locked (schematic designator R701)
R701_2 "10k" RESC1608X05N 61.73,22.835 r90 top locked (schematic designator R701)
R702_1 "10k" RESC1608X05N 88.815,22.861 r90 top locked (schematic designator R702)
R702_2 "10k" RESC1608X05N 60.142,22.835 r90 top locked (schematic designator R702)
R703_1 "10k" RESC1608X05N 87.227,22.861 r90 top locked (schematic designator R703)
R703_2 "10k" RESC1608X05N 58.555,22.835 r90 top locked (schematic designator R703)
R704_1 "10k" RESC1608X05N 85.64,22.861 r90 top locked (schematic designator R704)
R704_2 "10k" RESC1608X05N 56.967,22.835 r90 top locked (schematic designator R704)
R705_1 "10k" RESC1608X05N 84.052,22.861 r90 top locked (schematic designator R705)
R705_2 "10k" RESC1608X05N 55.38,22.835 r90 top locked (schematic designator R705)
R706_1 "10k" RESC1608X05N 82.465,22.861 r90 top locked (schematic designator R706)
R706_2 "10k" RESC1608X05N 53.792,22.835 r90 top locked (schematic designator R706)
R707_1 "10k" RESC1608X05N 80.877,22.861 r90 top locked (schematic designator R707)
R707_2 "10k" RESC1608X05N 52.205,22.835 r90 top locked (schematic designator R707)
R708_1 "10k" RESC1608X05N 88.9,15.557 r90 top locked (schematic designator R708)
R708_2 "10k" RESC1608X05N 59.531,16.351 r90 top locked (schematic designator R708)
R800_1 "10k" RESC1608X05N 101.282,50.482 r0 top (schematic designator R800)
R800_2 "10k" RESC1608X05N 46.038,50.482 r0 top (schematic designator R800)
R801_1 "10k" RESC1608X05N 152.559,42.513 r0 top (schematic designator R801)
R801_2 "10k" RESC1608X05N 99.357,42.545 r0 top locked (schematic designator R801)
R900 "390k" RESC1608X05N 11.43,86.995 r180 top
R901 "86k6" RESC1608X05N 11.43,88.582 r0 top
R902 "115k" RESC1608X05N 20.32,86.36 r270 top
R903 "39R" RESC2012X05N 19.367,92.392 r180 top locked
R904 "220k" RESC1608X05N 20.32,83.502 r270 top
R905 "10k" RESC1608X05N 18.098,88.582 r0 top
R1100 "150R" RESC1608X05N 105.727,66.345 r270 top
R1101 "150R" RESC1608X05N 108.267,66.345 r270 top
R1102 "150R" RESC1608X05N 129.54,67.88 r270 top
R1103 "150R" RESC1608X05N 135.255,67.88 r270 top
R1104 "150R" RESC1608X05N 140.97,67.88 r270 top
R1105 "150R" RESC1608X05N 146.685,67.88 r270 top
R1106 "150R" RESC1608X05N 83.82,67.88 r270 top
R1107 "150R" RESC1608X05N 89.535,67.88 r270 top
R1108 "150R" RESC1608X05N 95.25,67.88 r270 top
R1109 "150R" RESC1608X05N 99.235,67.88 r270 top
R1110 "150R" RESC1608X05N 100.642,66.358 r270 top
R1111 "150R" RESC1608X05N 103.188,66.345 r270 top
R1112 "150R" RESC1608X05N 39.052,66.358 r270 top
R1113 "150R" RESC1608X05N 42.227,66.358 r270 top
R1114 "150R" RESC1608X05N 45.402,66.345 r270 top
R1115 "150R" RESC1608X05N 48.578,66.358 r270 top
R1116 "150R" RESC1608X05N 51.752,66.358 r270 top
R1117 "150R" RESC1608X05N 54.927,66.358 r270 top
R1118 "10k" RESC1608X05N 122.687,60.642 r90 top
R1300_1 "100R" RESC1608X05N 136.505,29.833 r90 top (schematic designator R1300)
R1300_2 "100R" RESC1608X05N 83.165,29.833 r90 top (schematic designator R1300)
R1301_1 "100R" RESC1608X05N 139.045,29.833 r90 top (schematic designator R1301)
R1301_2 "100R" RESC1608X05N 85.705,29.833 r90 top (schematic designator R1301)
R1302_1 "100R" RESC1608X05N 141.585,29.833 r90 top (schematic designator R1302)
R1302_2 "100R" RESC1608X05N 88.245,29.833 r90 top (schematic designator R1302)
R1303_1 "100R" RESC1608X05N 144.125,29.833 r90 top (schematic designator R1303)
R1303_2 "100R" RESC1608X05N 90.785,29.833 r90 top (schematic designator R1303)
R1304_1 "100R" RESC1608X05N 146.665,29.833 r90 top (schematic designator R1304)
R1304_2 "100R" RESC1608X05N 93.325,29.833 r90 top (schematic designator R1304)
R1305_1 "100R" RESC1608X05N 149.205,29.833 r90 top (schematic designator R1305)
R1305_2 "100R" RESC1608X05N 95.865,29.833 r90 top (schematic designator R1305)
R1306_1 "100R" RESC1608X05N 151.745,29.833 r90 top (schematic designator R1306)
R1306_2 "100R" RESC1608X05N 98.405,29.833 r90 top (schematic designator R1306)
R1307_1 "100R" RESC1608X05N 121.265,29.833 r90 top (schematic designator R1307)
R1307_2 "100R" RESC1608X05N 67.925,29.833 r90 top (schematic designator R1307)
R1308_1 "100R" RESC1608X05N 123.805,29.833 r90 top (schematic designator R1308)
R1308_2 "100R" RESC1608X05N 70.465,29.833 r90 top (schematic designator R1308)
R1309_1 "100R" RESC1608X05N 126.345,29.833 r90 top (schematic designator R1309)
R1309_2 "100R" RESC1608X05N 73.005,29.833 r90 top (schematic designator R1309)
R1310_1 "100R" RESC1608X05N 128.885,29.833 r90 top (schematic designator R1310)
R1310_2 "100R" RESC1608X05N 75.545,29.833 r90 top (schematic designator R1310)
R1311_1 "100R" RESC1608X05N 131.425,29.833 r90 top (schematic designator R1311)
R1311_2 "100R" RESC1608X05N 78.085,29.833 r90 top (schematic designator R1311)
R1312_1 "100R" RESC1608X05N 133.965,29.833 r90 top (schematic designator R1312)
R1312_2 "100R" RESC1608X05N 80.625,29.833 r90 top (schematic designator R1312)
R1313_1 "100R" RESC1608X05N 106.045,29.845 r90 top (schematic designator R1313)
R1313_2 "100R" RESC1608X05N 52.705,29.845 r90 top (schematic designator R1313)
R1314_1 "100R" RESC1608X05N 108.585,29.845 r90 top (schematic designator R1314)
R1314_2 "100R" RESC1608X05N 55.245,29.845 r90 top (schematic designator R1314)
R1315_1 "100R" RESC1608X05N 111.125,29.845 r90 top (schematic designator R1315)
R1315_2 "100R" RESC1608X05N 57.785,29.845 r90 top (schematic designator R1315)
R1316_1 "100R" RESC1608X05N 113.665,29.845 r90 top (schematic designator R1316)
R1316_2 "100R" RESC1608X05N 60.325,29.845 r90 top (schematic designator R1316)
R1317_1 "100R" RESC1608X05N 116.205,29.845 r90 top (schematic designator R1317)
R1317_2 "100R" RESC1608X05N 62.865,29.845 r90 top (schematic designator R1317)
R1318_1 "100R" RESC1608X05N 118.745,29.845 r90 top (schematic designator R1318)
R1318_2 "100R" RESC1608X05N 65.405,29.845 r90 top (schematic designator R1318)
R1400_1 "1k2" RESC1608X05N 133.985,58.837 r90 top locked (schematic designator R1400)
R1400_2 "1k2" RESC1608X05N 80.328,58.788 r90 top locked (schematic designator R1400)
R1401_1 "100R" RESC2012X05N 127.635,59.69 r270 top (schematic designator R1401)
R1401_2 "100R" RESC2012X05N 73.66,59.69 r270 top locked (schematic designator R1401)
R1402_1 "820R" RESC1608X05N 135.496,58.837 r270 top locked (schematic designator R1402)
R1402_2 "820R" RESC1608X05N 81.915,58.788 r270 top locked (schematic designator R1402)
R1403_1 "270R" RESC1608X05N 135.78,63.818 r0 top (schematic designator R1403)
R1403_2 "270R" RESC1608X05N 82.074,63.817 r0 top (schematic designator R1403)
R1404_1 "1M" RESC1608X05N 136.93,58.837 r90 top locked (schematic designator R1404)
R1404_2 "1M" RESC1608X05N 83.502,58.788 r90 top locked (schematic designator R1404)
R1405_1 "120R" RESC1608X05N 40.957,29.21 r0 top (schematic designator R1405)
R1405_2 "120R" RESC1608X05N 25.082,29.21 r0 top (schematic designator R1405)
R1406_1 "0R" RESC1608X05N 132.08,58.737 r90 top locked (schematic designator R1406)
R1406_2 "0R" RESC1608X05N 78.422,58.788 r90 top locked (schematic designator R1406)
R1407_1 "0R" RESC1608X05N 132.08,61.436 r90 top (schematic designator R1407)
R1407_2 "0R" RESC1608X05N 78.422,61.436 r90 top (schematic designator R1407)
R1408_1 "0R" RESC1608X05N 145.732,61.119 r180 top (schematic designator R1408)
R1408_2 "0R" RESC1608X05N 92.392,61.119 r180 top (schematic designator R1408)
R1409_1 "0R" RESC1608X05N 145.732,58.261 r180 top locked (schematic designator R1409)
R1409_2 "0R" RESC1608X05N 92.392,58.261 r180 top locked (schematic designator R1409)
R1410_1 "0R" RESC1608X05N 145.732,56.515 r180 top locked (schematic designator R1410)
R1410_2 "0R" RESC1608X05N 92.392,56.515 r180 top locked (schematic designator R1410)
R1411_1 "0R" RESC1608X05N 145.732,55.34 r180 top (schematic designator R1411)
R1411_2 "0R" RESC1608X05N 92.392,55.086 r180 top locked (schematic designator R1411)
R1412_1 "0R" RESC1608X05N 145.732,53.34 r180 top locked (schematic designator R1412)
R1412_2 "0R" RESC1608X05N 92.392,53.34 r180 top locked (schematic designator R1412)
R1413_1 "0R" RESC1608X05N 145.732,51.911 r180 top locked (schematic designator R1413)
R1413_2 "0R" RESC1608X05N 92.392,51.911 r180 top locked (schematic designator R1413)
R1414_1 "0R" RESC1608X05N 145.732,50.006 r180 top locked (schematic designator R1414)
R1414_2 "0R" RESC1608X05N 92.392,50.165 r180 top locked (schematic designator R1414)
R1415_1 "0R" RESC1608X05N 145.732,48.578 r180 top locked (schematic designator R1415)
R1415_2 "0R" RESC1608X05N 92.392,48.736 r180 top locked (schematic designator R1415)
R1416_1 "0R" RESC1608X05N 145.732,46.915 r180 top locked (schematic designator R1416)
R1416_2 "0R" RESC1608X05N 92.372,46.97 r180 top locked (schematic designator R1416)
R1417_1 "0R" RESC1608X05N 145.732,45.402 r180 top locked (schematic designator R1417)
R1417_2 "0R" RESC1608X05N 92.372,45.605 r180 top locked (schematic designator R1417)
R1418_1 "120R" RESC1608X05N 34.925,29.21 r0 top (schematic designator R1418)
R1418_2 "120R" RESC1608X05N 19.05,29.21 r0 top (schematic designator R1418)
R1419_1 "1k2" RESC1608X05N 148.273,53.499 r90 top (schematic designator R1419)
R1419_2 "1k2" RESC1608X05N 95.135,53.734 r90 top (schematic designator R1419)
R1420_1 "1k2" RESC1608X05N 150.336,53.499 r90 top (schematic designator R1420)
R1420_2 "1k2" RESC1608X05N 97.223,53.737 r90 top (schematic designator R1420)
R1421_1 "10k" RESC1608X05N 154.686,47.879 r90 top (schematic designator R1421)
R1421_2 "10k" RESC1608X05N 74.93,53.721 r180 top (schematic designator R1421)
R1422_1 "10k" RESC1608X05N 154.686,51.244 r90 top (schematic designator R1422)
R1422_2 "10k" RESC1608X05N 74.93,55.118 r180 top (schematic designator R1422)
R1423_1 "10k" RESC1608X05N 152.432,52.665 r180 top (schematic designator R1423)
R1423_2 "10k" RESC1608X05N 74.93,56.515 r180 top (schematic designator R1423)
R1424_1 "10k" RESC1608X05N 152.432,54.199 r180 top (schematic designator R1424)
R1424_2 "10k" RESC1608X05N 89.725,55.452 r90 top (schematic designator R1424)
R1425_1 "10k" RESC1608X05N 15.748,30.861 r90 top (schematic designator R1425)
R1425_2 "10k" RESC1608X05N 10.287,30.861 r90 top (schematic designator R1425)
R1426_1 "10k" RESC1608X05N 14.351,30.861 r90 top (schematic designator R1426)
R1426_2 "10k" RESC1608X05N 8.89,30.861 r90 top (schematic designator R1426)
R1427_1 "10k" RESC1608X05N 12.954,30.861 r90 top (schematic designator R1427)
R1427_2 "10k" RESC1608X05N 7.493,30.861 r90 top (schematic designator R1427)
R1500 "130R" RESC5025X07N 117.505,79.375 r270 top
R1501 "130R" RESC5025X07N 123.19,79.375 r270 top
R1502 "130R" RESC5025X07N 128.905,79.375 r270 top
R1503 "130R" RESC5025X07N 134.62,79.375 r270 top
R1504 "130R" RESC5025X07N 140.335,79.375 r270 top
R1505 "130R" RESC5025X07N 146.05,79.375 r270 top
R1506 "130R" RESC5025X07N 117.475,90.805 r90 top locked
R1507 "130R" RESC5025X07N 123.19,90.805 r90 top locked
R1508 "130R" RESC5025X07N 128.905,90.805 r90 top
R1509 "130R" RESC5025X07N 134.62,90.805 r90 top locked
R1510 "130R" RESC5025X07N 140.315,90.805 r90 top locked
R1511 "130R" RESC5025X07N 146.05,90.805 r90 top locked
R1512 "3k3" RESC1608X05N 115.252,70.485 r270 top locked
R1513 "3k3" RESC1608X05N 120.968,70.485 r270 top locked
R1514 "3k3" RESC1608X05N 126.682,70.485 r270 top locked
R1515 "3k3" RESC1608X05N 132.398,70.485 r270 top locked
R1516 "3k3" RESC1608X05N 138.112,70.485 r270 top locked
R1517 "3k3" RESC1608X05N 143.918,70.485 r270 top
R1518 "130R" RESC5025X07N 83.185,79.375 r270 top
R1519 "130R" RESC5025X07N 88.9,79.375 r270 top
R1520 "130R" RESC5025X07N 94.615,79.375 r270 top
R1521 "130R" RESC5025X07N 100.33,79.375 r270 top
R1522 "130R" RESC5025X07N 106.045,79.375 r270 top
R1523 "130R" RESC5025X07N 111.76,79.375 r270 top
R1524 "130R" RESC5025X07N 83.185,90.805 r90 top locked
R1525 "130R" RESC5025X07N 88.9,90.805 r90 top locked
R1526 "130R" RESC5025X07N 94.615,90.805 r90 top locked
R1527 "130R" RESC5025X07N 100.33,90.805 r90 top locked
R1528 "130R" RESC5025X07N 106.045,90.805 r90 top locked
R1529 "130R" RESC5025X07N 111.76,90.805 r90 top locked
R1530 "3k3" RESC1608X05N 80.962,70.485 r270 top locked
R1531 "3k3" RESC1608X05N 86.677,70.485 r270 top locked
R1532 "3k3" RESC1608X05N 92.392,70.485 r270 top locked
R1533 "3k3" RESC1608X05N 98.108,70.485 r270 top locked
R1534 "3k3" RESC1608X05N 103.822,70.485 r270 top locked
R1535 "3k3" RESC1608X05N 109.537,70.485 r270 top locked
R1536 "130R" RESC5025X07N 48.895,79.375 r270 top
R1537 "130R" RESC5025X07N 54.61,79.375 r270 top
R1538 "130R" RESC5025X07N 60.325,79.375 r270 top
R1539 "130R" RESC5025X07N 66.04,79.375 r270 top
R1540 "130R" RESC5025X07N 71.755,79.375 r270 top
R1541 "130R" RESC5025X07N 77.465,79.375 r270 top
R1542 "130R" RESC5025X07N 48.895,90.805 r90 top locked
R1543 "130R" RESC5025X07N 54.61,90.805 r90 top locked
R1544 "130R" RESC5025X07N 60.325,90.805 r90 top locked
R1545 "130R" RESC5025X07N 66.04,90.805 r90 top locked
R1546 "130R" RESC5025X07N 71.755,90.805 r90 top locked
R1547 "130R" RESC5025X07N 77.45,90.805 r90 top locked
R1548 "3k3" RESC1608X05N 46.672,70.485 r270 top locked
R1549 "3k3" RESC1608X05N 52.387,70.485 r270 top locked
R1550 "3k3" RESC1608X05N 58.102,70.485 r270 top locked
R1551 "3k3" RESC1608X05N 63.817,70.485 r270 top locked
R1552 "3k3" RESC1608X05N 69.532,70.485 r270 top locked
R1553 "3k3" RESC1608X05N 75.248,70.485 r270 top locked
SJ300 "0R" RESC1608X05N 112.415,12.395 r0 top
SJ301 "0R" RESC1608X05N 153.035,12.383 r0 top
T1500 "NX2301P,215" NXP-SOT23_N 118.11,71.12 r90 top
T1501 "NX2301P,215" NXP-SOT23_N 123.825,71.12 r90 top
T1502 "NX2301P,215" NXP-SOT23_N 129.54,71.12 r90 top locked
T1503 "NX2301P,215" NXP-SOT23_N 135.267,71.12 r90 top
T1504 "NX2301P,215" NXP-SOT23_N 140.97,71.12 r90 top
T1505 "NX2301P,215" NXP-SOT23_N 146.685,71.12 r90 top
T1506 "NX2301P,215" NXP-SOT23_N 83.82,71.12 r90 top
T1507 "NX2301P,215" NXP-SOT23_N 89.535,71.12 r90 top
T1508 "NX2301P,215" NXP-SOT23_N 95.25,71.12 r90 top
T1509 "NX2301P,215" NXP-SOT23_N 100.98,71.12 r90 top
T1510 "NX2301P,215" NXP-SOT23_N 106.66,71.12 r90 top
T1511 "NX2301P,215" NXP-SOT23_N 112.395,71.12 r90 top
T1512 "NX2301P,215" NXP-SOT23_N 49.53,71.12 r90 top
T1513 "NX2301P,215" NXP-SOT23_N 55.245,71.12 r90 top
T1514 "NX2301P,215" NXP-SOT23_N 60.96,71.12 r90 top
T1515 "NX2301P,215" NXP-SOT23_N 66.675,71.12 r90 top
T1516 "NX2301P,215" NXP-SOT23_N 72.39,71.12 r90 top
T1517 "NX2301P,215" NXP-SOT23_N 78.105,71.12 r90 top
TP900 "Testpoint_Square" Testpoint_S1 12.383,22.225 r90 top locked
TP901 "Testpoint_Square" Testpoint_S1 9.842,22.225 r90 top locked
TP902 "Testpoint_Square" Testpoint_S1 44.926,72.866 r90 top
TP903 "Testpoint_Square" Testpoint_S1 43.18,72.866 r90 top
TP1400_1 "Testpoint_Square" Testpoint_S1 132.398,63.817 r180 top (schematic designator TP1400)
TP1400_2 "Testpoint_Square" Testpoint_S1 78.74,63.817 r180 top (schematic designator TP1400)
TP1401_1 "Testpoint_Square" Testpoint_S1 148.887,59.214 r0 top (schematic designator TP1401)
TP1401_2 "Testpoint_Square" Testpoint_S1 95.567,59.214 r180 top (schematic designator TP1401)
TP1402_1 "Testpoint_Square" Testpoint_S1 148.907,60.642 r0 top (schematic designator TP1402)
TP1402_2 "Testpoint_Square" Testpoint_S1 95.567,60.642 r180 top (schematic designator TP1402)
TP1403_1 "Testpoint_Square" Testpoint_S1 140.97,63.817 r180 top (schematic designator TP1403)
TP1403_2 "Testpoint_Square" Testpoint_S1 87.312,63.817 r0 top (schematic designator TP1403)
TP1404_1 "Testpoint_Square" Testpoint_S1 51.435,10.954 r90 top locked (schematic designator TP1404)
TP1404_2 "Testpoint_Square" Testpoint_S1 36.512,10.954 r90 top locked (schematic designator TP1404)
TP1405_1 "Testpoint_Square" Testpoint_S1 48.59,10.954 r90 top locked (schematic designator TP1405)
TP1405_2 "Testpoint_Square" Testpoint_S1 33.387,10.954 r90 top locked (schematic designator TP1405)
TP1406_1 "Testpoint_Square" Testpoint_S1 40.957,10.954 r90 top locked (schematic designator TP1406)
TP1406_2 "Testpoint_Square" Testpoint_S1 25.717,10.954 r90 top locked (schematic designator TP1406)
TP1407_1 "Testpoint_Square" Testpoint_S1 43.974,10.954 r90 top locked (schematic designator TP1407)
TP1407_2 "Testpoint_Square" Testpoint_S1 29.19,10.954 r90 top locked (schematic designator TP1407)
TP1408_1 "Testpoint_Square" Testpoint_S1 148.907,57.785 r180 top (schematic designator TP1408)
TP1408_2 "Testpoint_Square" Testpoint_S1 95.567,57.785 r180 top locked (schematic designator TP1408)
TP1409_1 "Testpoint_Square" Testpoint_S1 148.887,56.356 r180 top (schematic designator TP1409)
TP1409_2 "Testpoint_Square" Testpoint_S1 95.567,56.356 r180 top (schematic designator TP1409)
TR900 "WE_750313457" WE_750313457 29.527,86.677 r0 top locked
TR1400_1 "HM2102NL" HM2102NL 37.941,20.637 r90 top locked (schematic designator TR1400)
TR1400_2 "HM2102NL" HM2102NL 22.066,20.637 r90 top locked (schematic designator TR1400)
U100_1 "AD8628ARTZ-R2" ADI-RJ-5_M 104.299,21.431 r270 top (schematic designator U100)
U100_2 "AD8628ARTZ-R2" ADI-RJ-5_M 75.724,21.431 r270 top locked (schematic designator U100)
U101_1 "AD8628ARTZ-R2" ADI-RJ-5_M 26.67,63.182 r0 top locked (schematic designator U101)
U101_2 "AD8628ARTZ-R2" ADI-RJ-5_M 26.67,55.88 r0 top locked (schematic designator U101)
U600_1 "LM5161QPWPRQ1" PWP0014A 112.395,51.435 r0 top (schematic designator U600)
U600_2 "LM5161QPWPRQ1" PWP0014A 57.785,51.435 r0 top (schematic designator U600)
U700_1 "TCA6408APWR" PW0016A_L 84.455,17.462 r180 top locked (schematic designator U700)
U700_2 "TCA6408APWR" PW0016A_L 55.086,18.256 r180 top locked (schematic designator U700)
U1100 "ACPL-217" SOIC127P700X220-4N 104.457,60.642 r270 top locked
U1101 "ACPL-217" SOIC127P700X220-4N 107.632,60.642 r270 top locked
U1102 "ACPL-217" SOIC127P700X220-4N 110.807,60.642 r270 top locked
U1103 "ACPL-217" SOIC127P700X220-4N 113.983,60.642 r270 top locked
U1104 "ACPL-217" SOIC127P700X220-4N 117.157,60.642 r270 top locked
U1105 "ACPL-217" SOIC127P700X220-4N 120.332,60.642 r270 top locked
U1106 "ACPL-217" SOIC127P700X220-4N 57.468,60.642 r270 top locked
U1107 "ACPL-217" SOIC127P700X220-4N 60.642,60.642 r270 top locked
U1108 "ACPL-217" SOIC127P700X220-4N 63.817,60.642 r270 top locked
U1109 "ACPL-217" SOIC127P700X220-4N 66.992,60.642 r270 top locked
U1110 "ACPL-217" SOIC127P700X220-4N 98.108,60.642 r270 top locked
U1111 "ACPL-217" SOIC127P700X220-4N 101.282,60.642 r270 top locked
U1112 "ACPL-217" SOIC127P700X220-4N 38.417,60.642 r270 top locked
U1113 "ACPL-217" SOIC127P700X220-4N 41.593,60.642 r270 top locked
U1114 "ACPL-217" SOIC127P700X220-4N 44.767,60.642 r270 top locked
U1115 "ACPL-217" SOIC127P700X220-4N 47.942,60.642 r270 top locked
U1116 "ACPL-217" SOIC127P700X220-4N 51.117,60.642 r270 top locked
U1117 "ACPL-217" SOIC127P700X220-4N 54.292,60.642 r270 top locked
X200 "molex_microfit_3_12x2_THT" MOLEX_MICROFIT_12x2_THT 131,2.5 r180 top locked
X201 "molex_microfit_3_08x2_THT" MOLEX_MICROFIT_08x2_THT 96.5,2.5 r180 top locked
X202 "molex_microfit_3_08x2_THT" MOLEX_MICROFIT_08x2_THT 68,2.5 r180 top locked
X400 "gen_pinheader_2.54_2x9" Pinheader_2.54_2x9 16.51,42.545 r180 top locked
X401 "gen_pinheader_2.54_2x9" Pinheader_2.54_2x9 16.51,50.165 r180 top locked
X402 "gen_pinheader_2.54_2x5" Pinheader_2.54_2x5 36.83,42.545 r180 top locked
X403 "gen_pinheader_2.54_2x5" Pinheader_2.54_2x5 36.83,50.165 r180 top locked
X404 "gen_pinheader_2.54_2x10" Pinheader_2.54_2x10 17.78,34.925 r180 top locked
X405 "gen_pinheader_2.54_2x4" Pinheader_2.54_2x4 38.1,34.925 r180 top locked
X500 "molex_microfit_3_01x2_THT" MOLEX_MICROFIT_01x2_THT 50,2.5 r180 top locked
X501 "molex_microfit_3_01x2_THT" MOLEX_MICROFIT_01x2_THT 42.5,2.5 r180 top locked
X502 "molex_microfit_3_01x2_THT" MOLEX_MICROFIT_01x2_THT 35,2.5 r180 top locked
X503 "molex_microfit_3_01x2_THT" MOLEX_MICROFIT_01x2_THT 27.5,2.5 r180 top locked
X900 "gen_pinheader_2.54_2" Pinheader_2.54_2 40.322,75.248 r180 top locked
X1000 "samtec_TSW-102-07-G-D" Pinheader_2.54_2x2 11.112,17.462 r0 top locked
X1001 "molex_microfit_3_01x2_THT" MOLEX_MICROFIT_01x2_THT 20,2.5 r180 top locked
X1002 "molex_microfit_3_01x2_THT" MOLEX_MICROFIT_01x2_THT 12.5,2.5 r180 top locked
Z1300_1 "MMSZ4692T1G" ONSC-SOD-123-2-425-04_V 139.045,38.088 r0 top (schematic designator Z1300)
Z1300_2 "MMSZ4692T1G" ONSC-SOD-123-2-425-04_V 85.705,38.088 r0 top (schematic designator Z1300)
Z1301_1 "MMSZ4692T1G" ONSC-SOD-123-2-425-04_V 141.585,35.548 r0 top locked (schematic designator Z1301)
Z1301_2 "MMSZ4692T1G" ONSC-SOD-123-2-425-04_V 88.245,35.548 r0 top locked (schematic designator Z1301)
Z1302_1 "MMSZ4692T1G" ONSC-SOD-123-2-425-04_V 144.125,38.088 r0 top locked (schematic designator Z1302)
Z1302_2 "MMSZ4692T1G" ONSC-SOD-123-2-425-04_V 90.785,38.088 r0 top locked (schematic designator Z1302)
Z1303_1 "MMSZ4692T1G" ONSC-SOD-123-2-425-04_V 146.665,35.548 r0 top locked (schematic designator Z1303)
Z1303_2 "MMSZ4692T1G" ONSC-SOD-123-2-425-04_V 93.325,35.548 r0 top locked (schematic designator Z1303)
Z1304_1 "MMSZ4692T1G" ONSC-SOD-123-2-425-04_V 149.205,38.088 r0 top locked (schematic designator Z1304)
Z1304_2 "MMSZ4692T1G" ONSC-SOD-123-2-425-04_V 95.865,38.088 r0 top locked (schematic designator Z1304)
Z1305_1 "MMSZ4692T1G" ONSC-SOD-123-2-425-04_V 151.745,35.548 r0 top locked (schematic designator Z1305)
Z1305_2 "MMSZ4692T1G" ONSC-SOD-123-2-425-04_V 98.405,35.548 r0 top locked (schematic designator Z1305)
Z1306_1 "MMSZ4692T1G" ONSC-SOD-123-2-425-04_V 123.805,38.088 r0 top (schematic designator Z1306)
Z1306_2 "MMSZ4692T1G" ONSC-SOD-123-2-425-04_V 70.465,38.088 r0 top (schematic designator Z1306)
Z1307_1 "MMSZ4692T1G" ONSC-SOD-123-2-425-04_V 126.345,35.548 r0 top locked (schematic designator Z1307)
Z1307_2 "MMSZ4692T1G" ONSC-SOD-123-2-425-04_V 73.005,35.548 r0 top locked (schematic designator Z1307)
Z1308_1 "MMSZ4692T1G" ONSC-SOD-123-2-425-04_V 128.885,38.088 r0 top locked (schematic designator Z1308)
Z1308_2 "MMSZ4692T1G" ONSC-SOD-123-2-425-04_V 75.545,38.088 r0 top locked (schematic designator Z1308)
Z1309_1 "MMSZ4692T1G" ONSC-SOD-123-2-425-04_V 131.425,35.548 r0 top locked (schematic designator Z1309)
Z1309_2 "MMSZ4692T1G" ONSC-SOD-123-2-425-04_V 78.085,35.548 r0 top locked (schematic designator Z1309)
Z1310_1 "MMSZ4692T1G" ONSC-SOD-123-2-425-04_V 133.965,38.088 r0 top locked (schematic designator Z1310)
Z1310_2 "MMSZ4692T1G" ONSC-SOD-123-2-425-04_V 80.625,38.088 r0 top locked (schematic designator Z1310)
Z1311_1 "MMSZ4692T1G" ONSC-SOD-123-2-425-04_V 136.505,35.548 r0 top locked (schematic designator Z1311)
Z1311_2 "MMSZ4692T1G" ONSC-SOD-123-2-425-04_V 83.165,35.548 r0 top locked (schematic designator Z1311)